# Altium PCB STAND_SSD_2246(CPU).PcbDoc (part 1 of 7)
Units mm, origin at the board's own origin, x right, y up, seen from the top; angles counter-clockwise.
Board outline 70 x 170 mm, 8 copper layers (L1:Top, L2:GND, L3:Sig, L4:VCC, L5:Sig, L6:Sig, L7:GND, L8:Bot), stack 1.112 mm thick; 174 components, 271 nets, 1671 pads, 771 vias.
Unrouted connection lines stored in the file: 138.
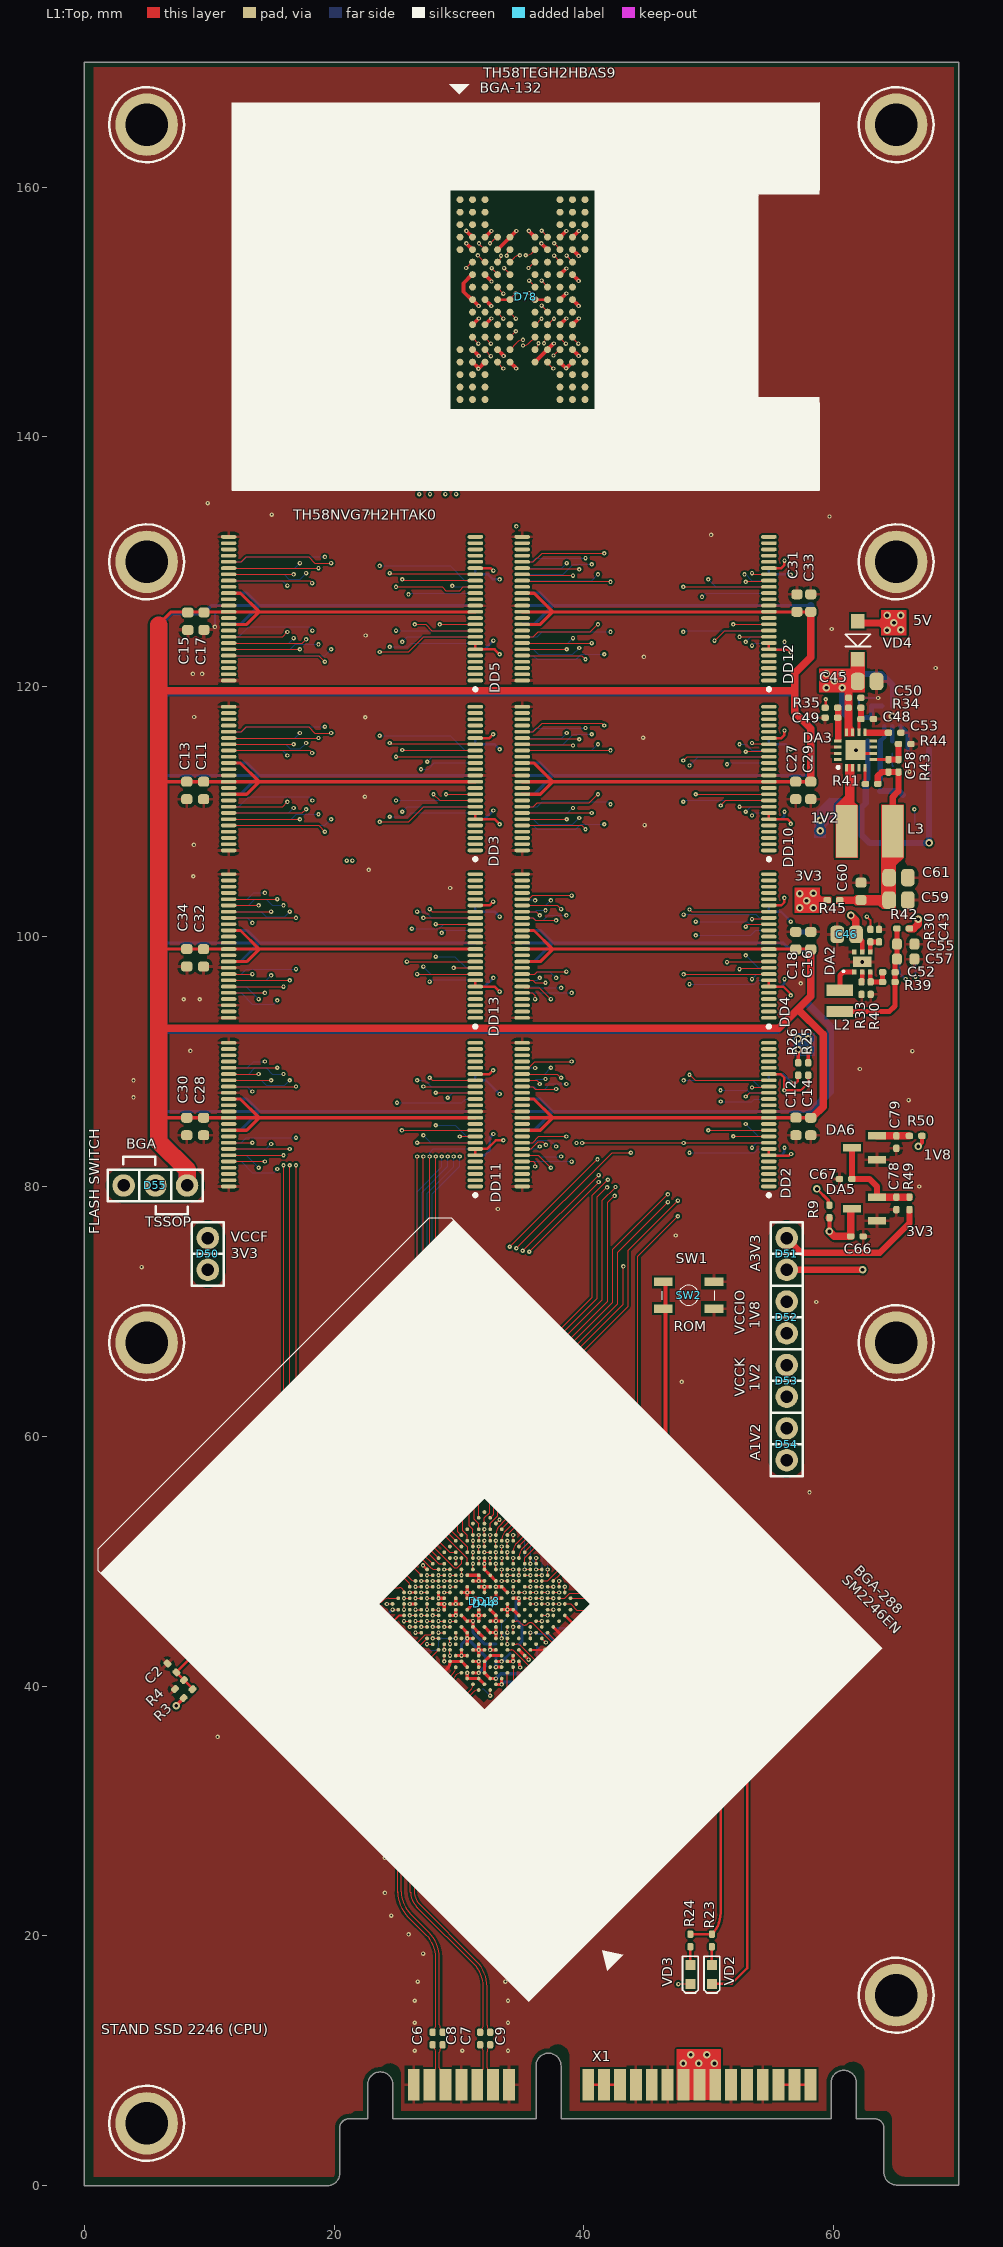
[diagram p0: L1:Top view]
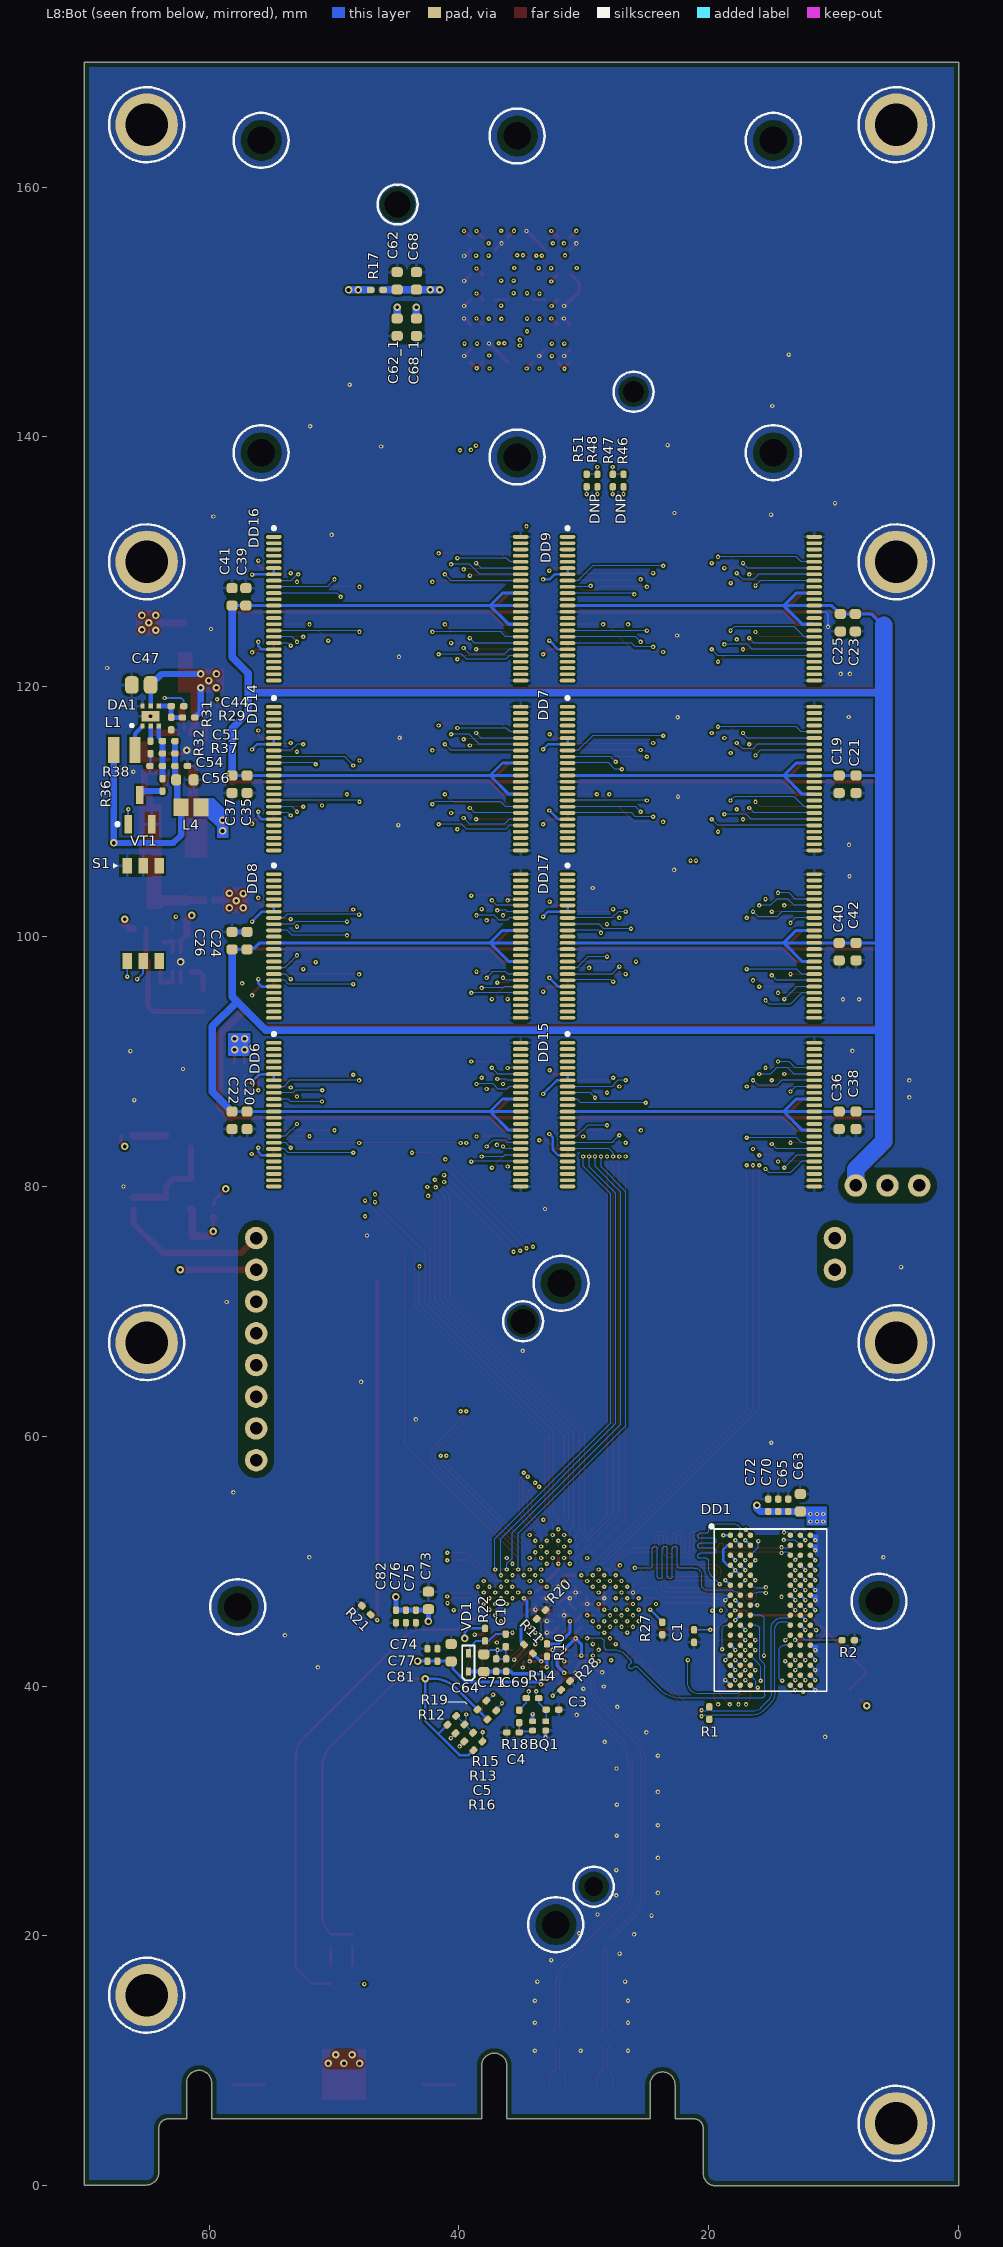
[diagram p1: L8:Bot view, seen from below]
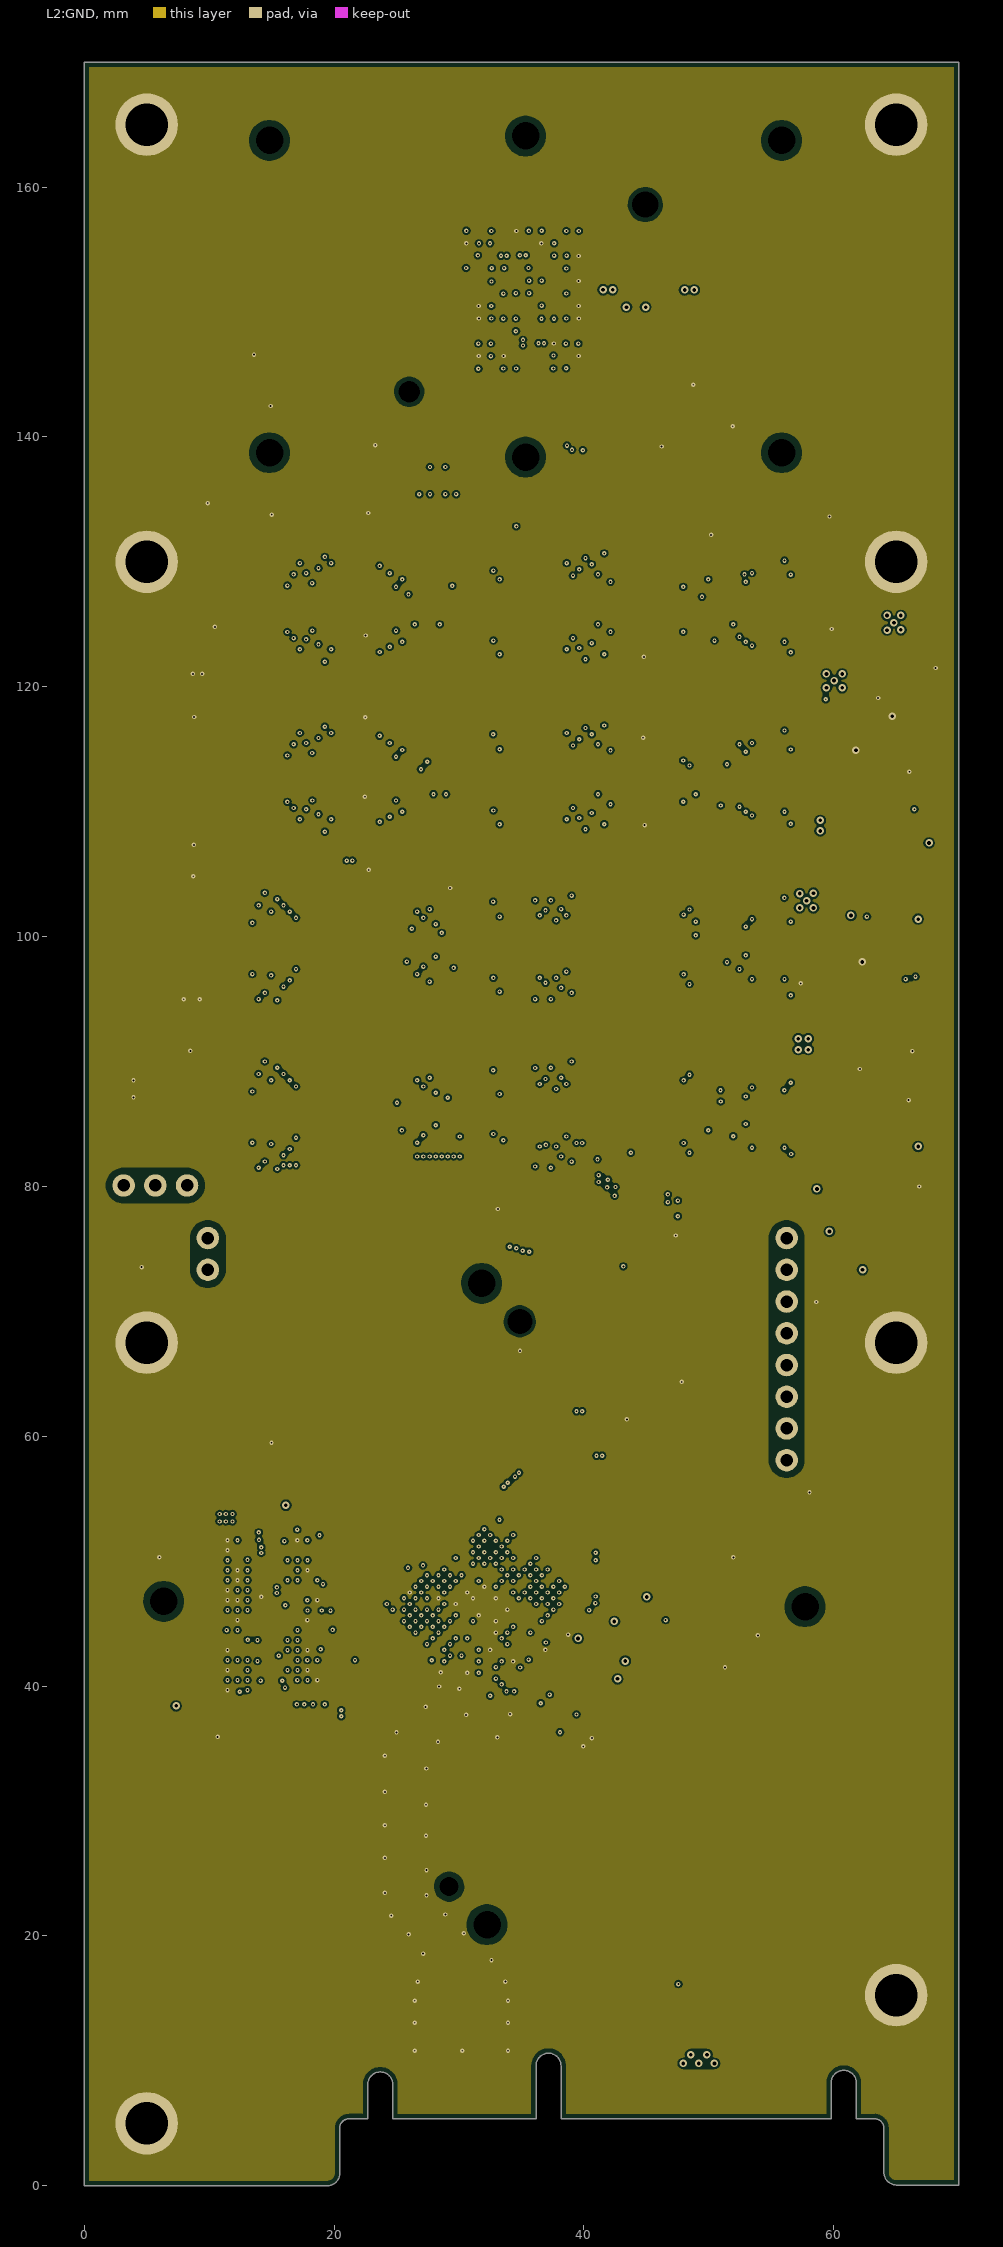
[diagram p2: L2:GND]
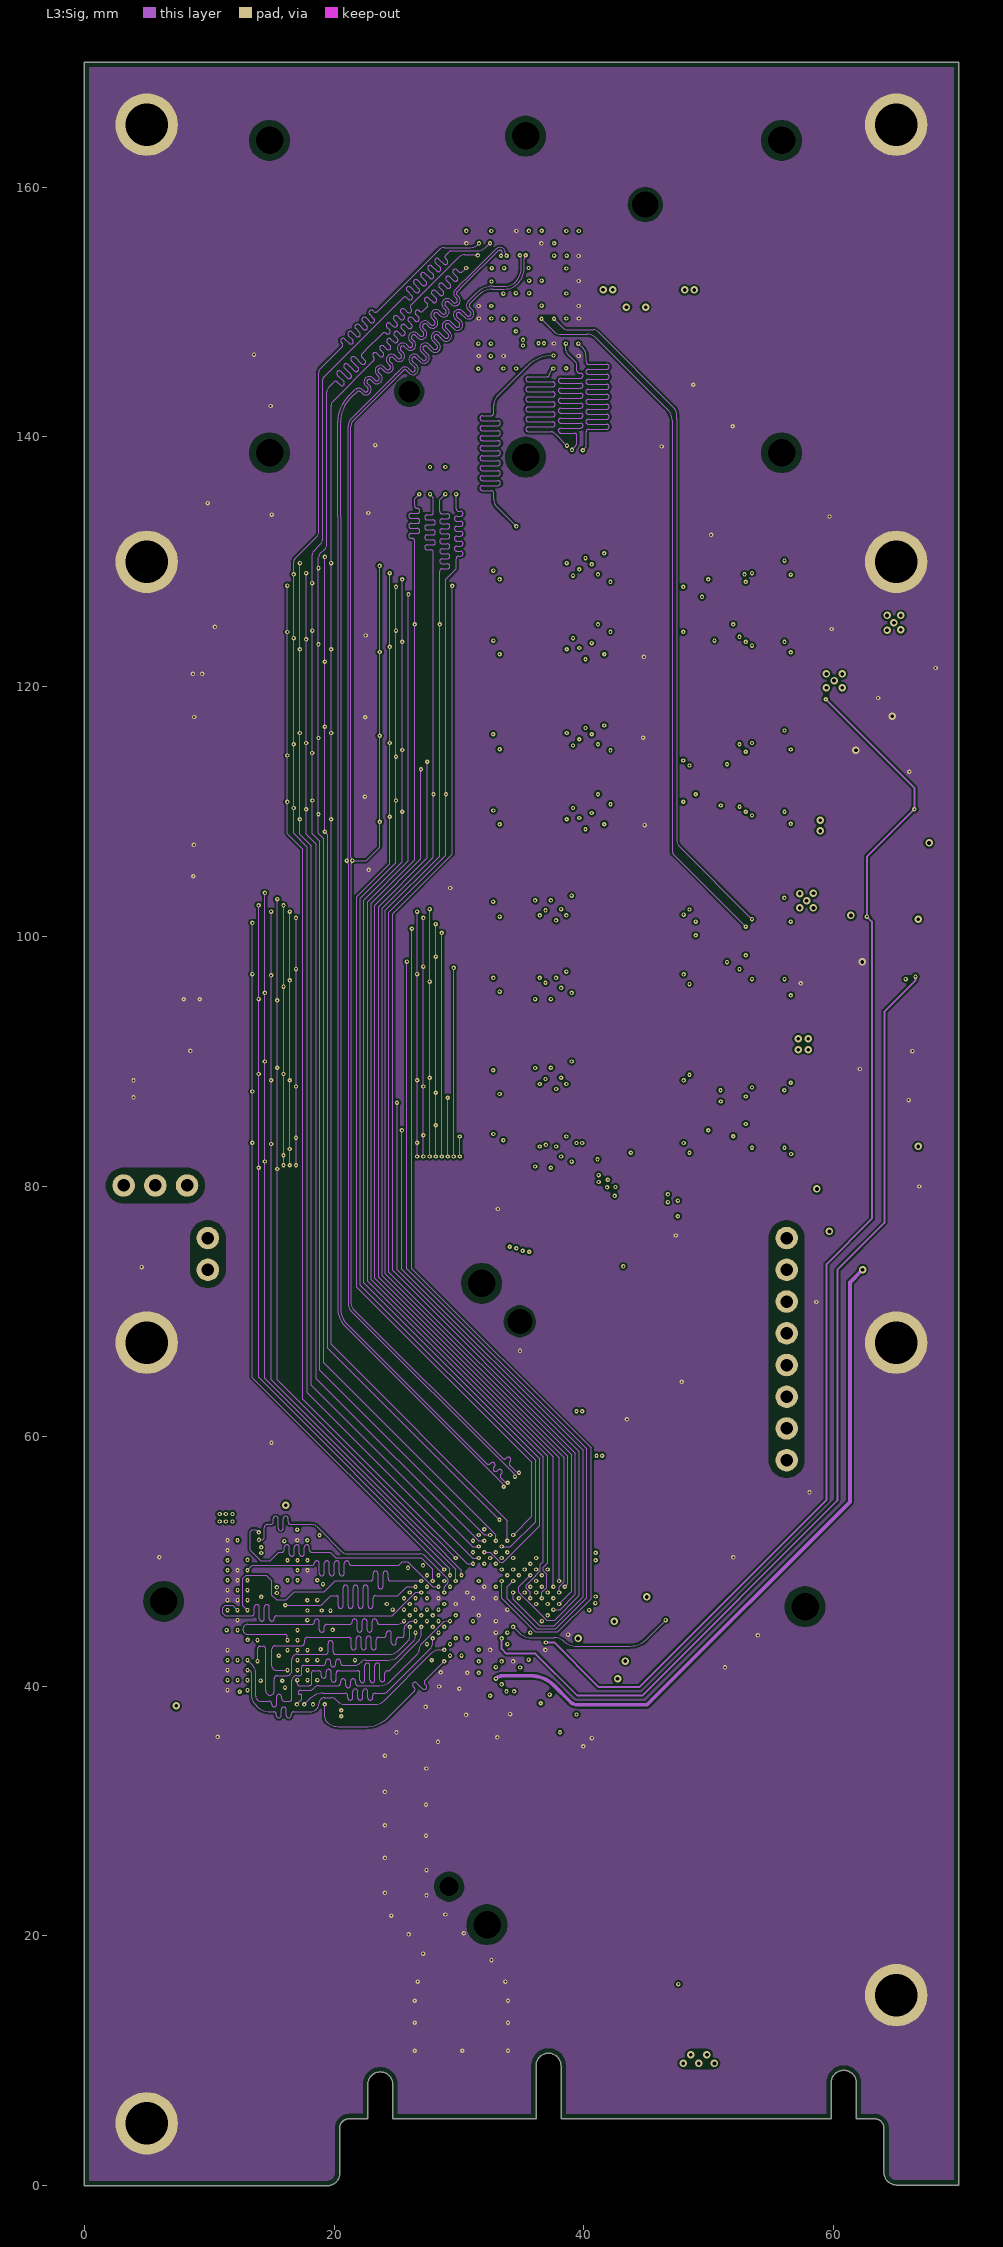
[diagram p3: L3:Sig]
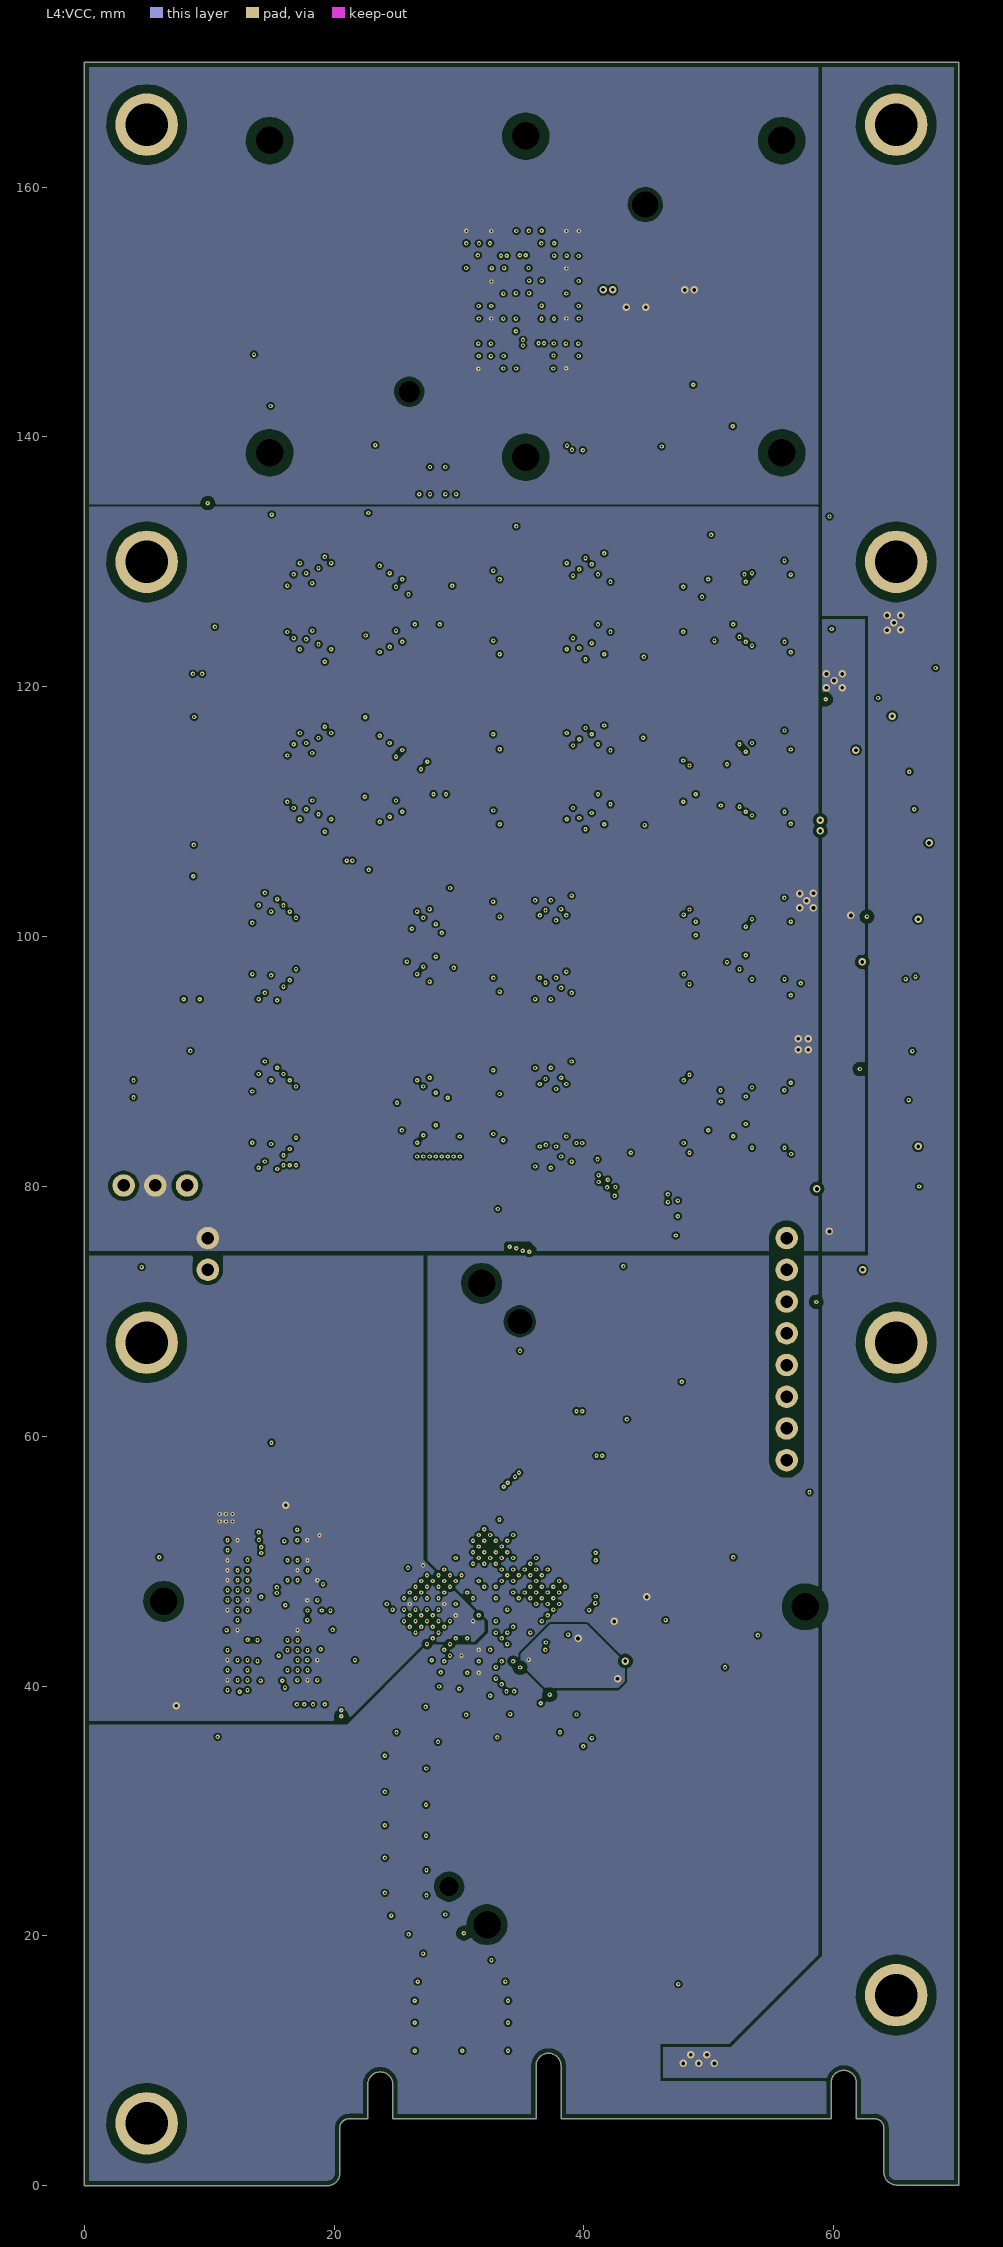
[diagram p4: L4:VCC]
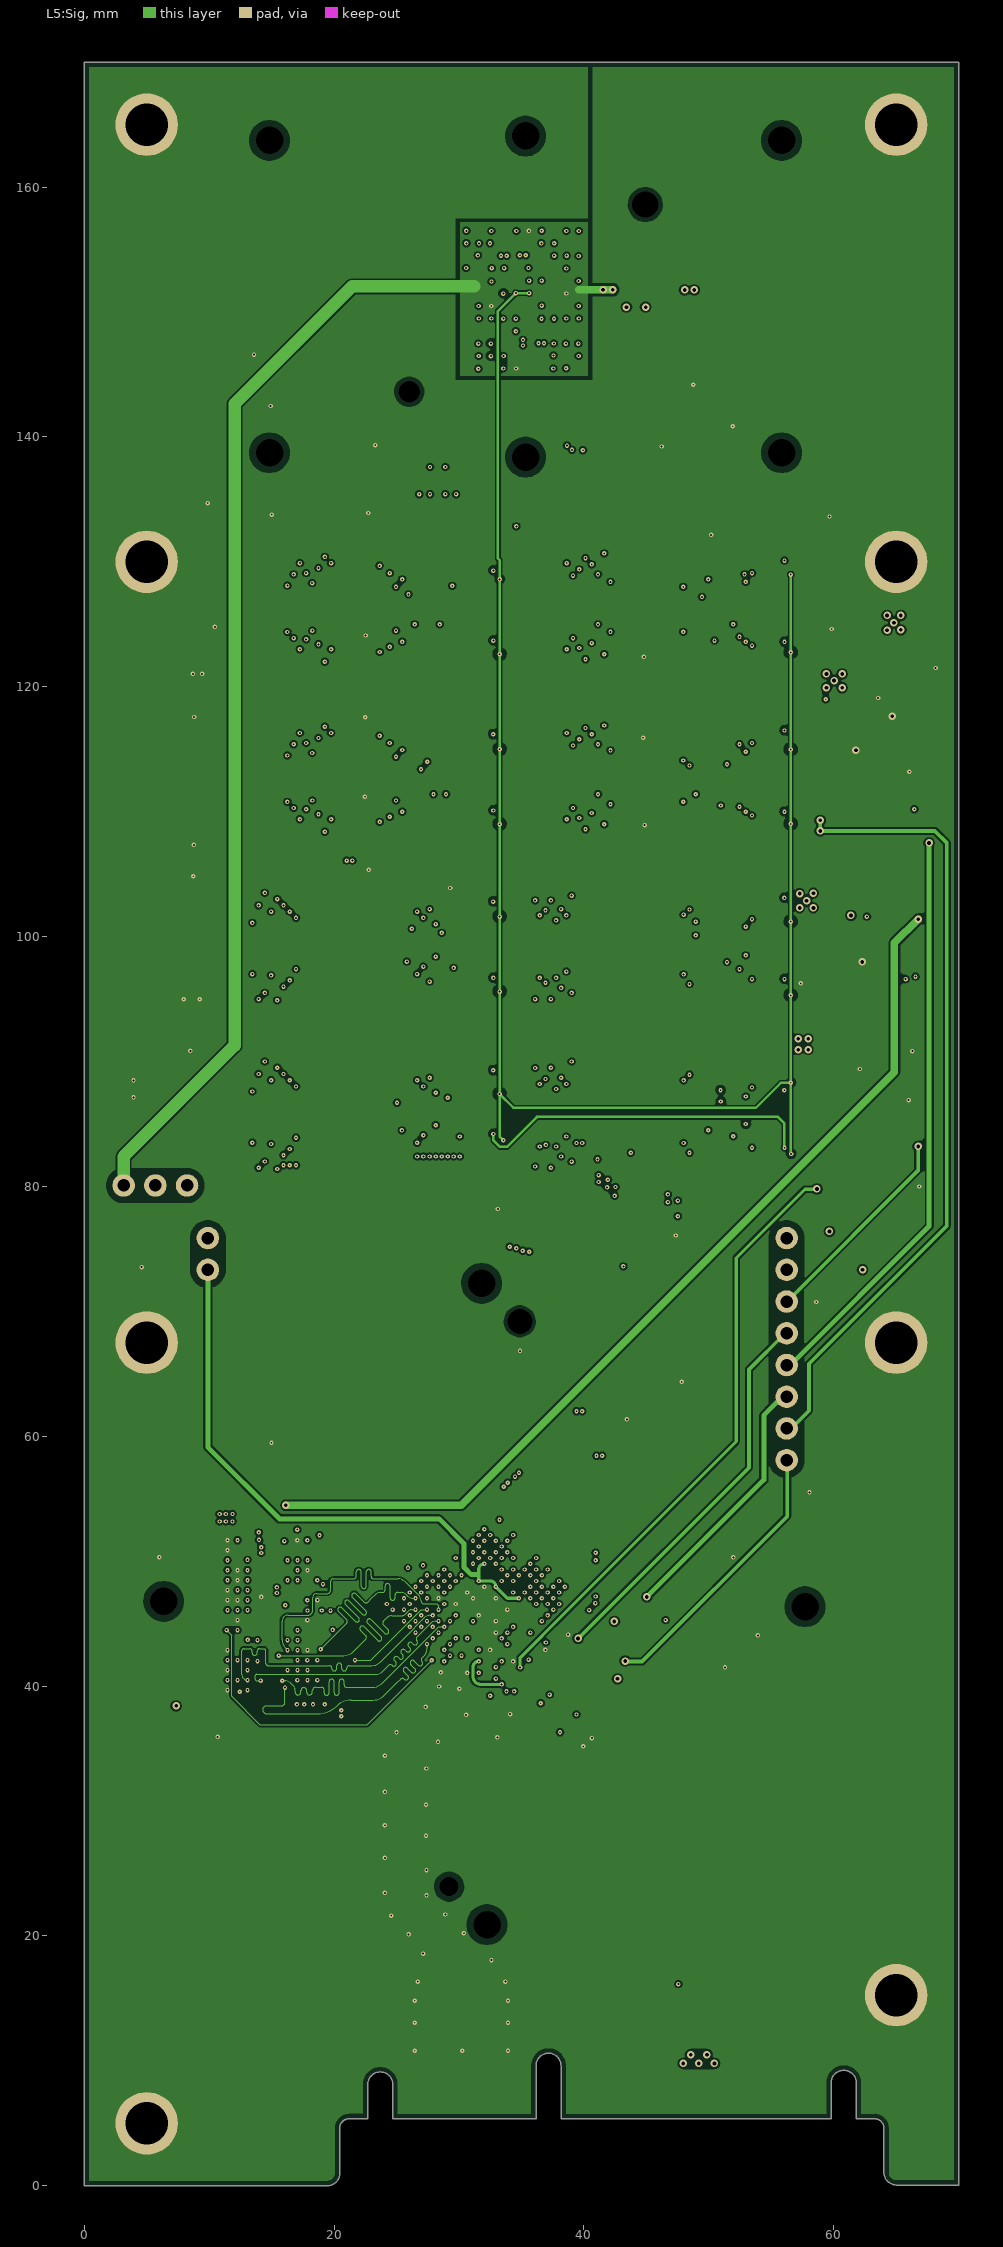
[diagram p5: L5:Sig]
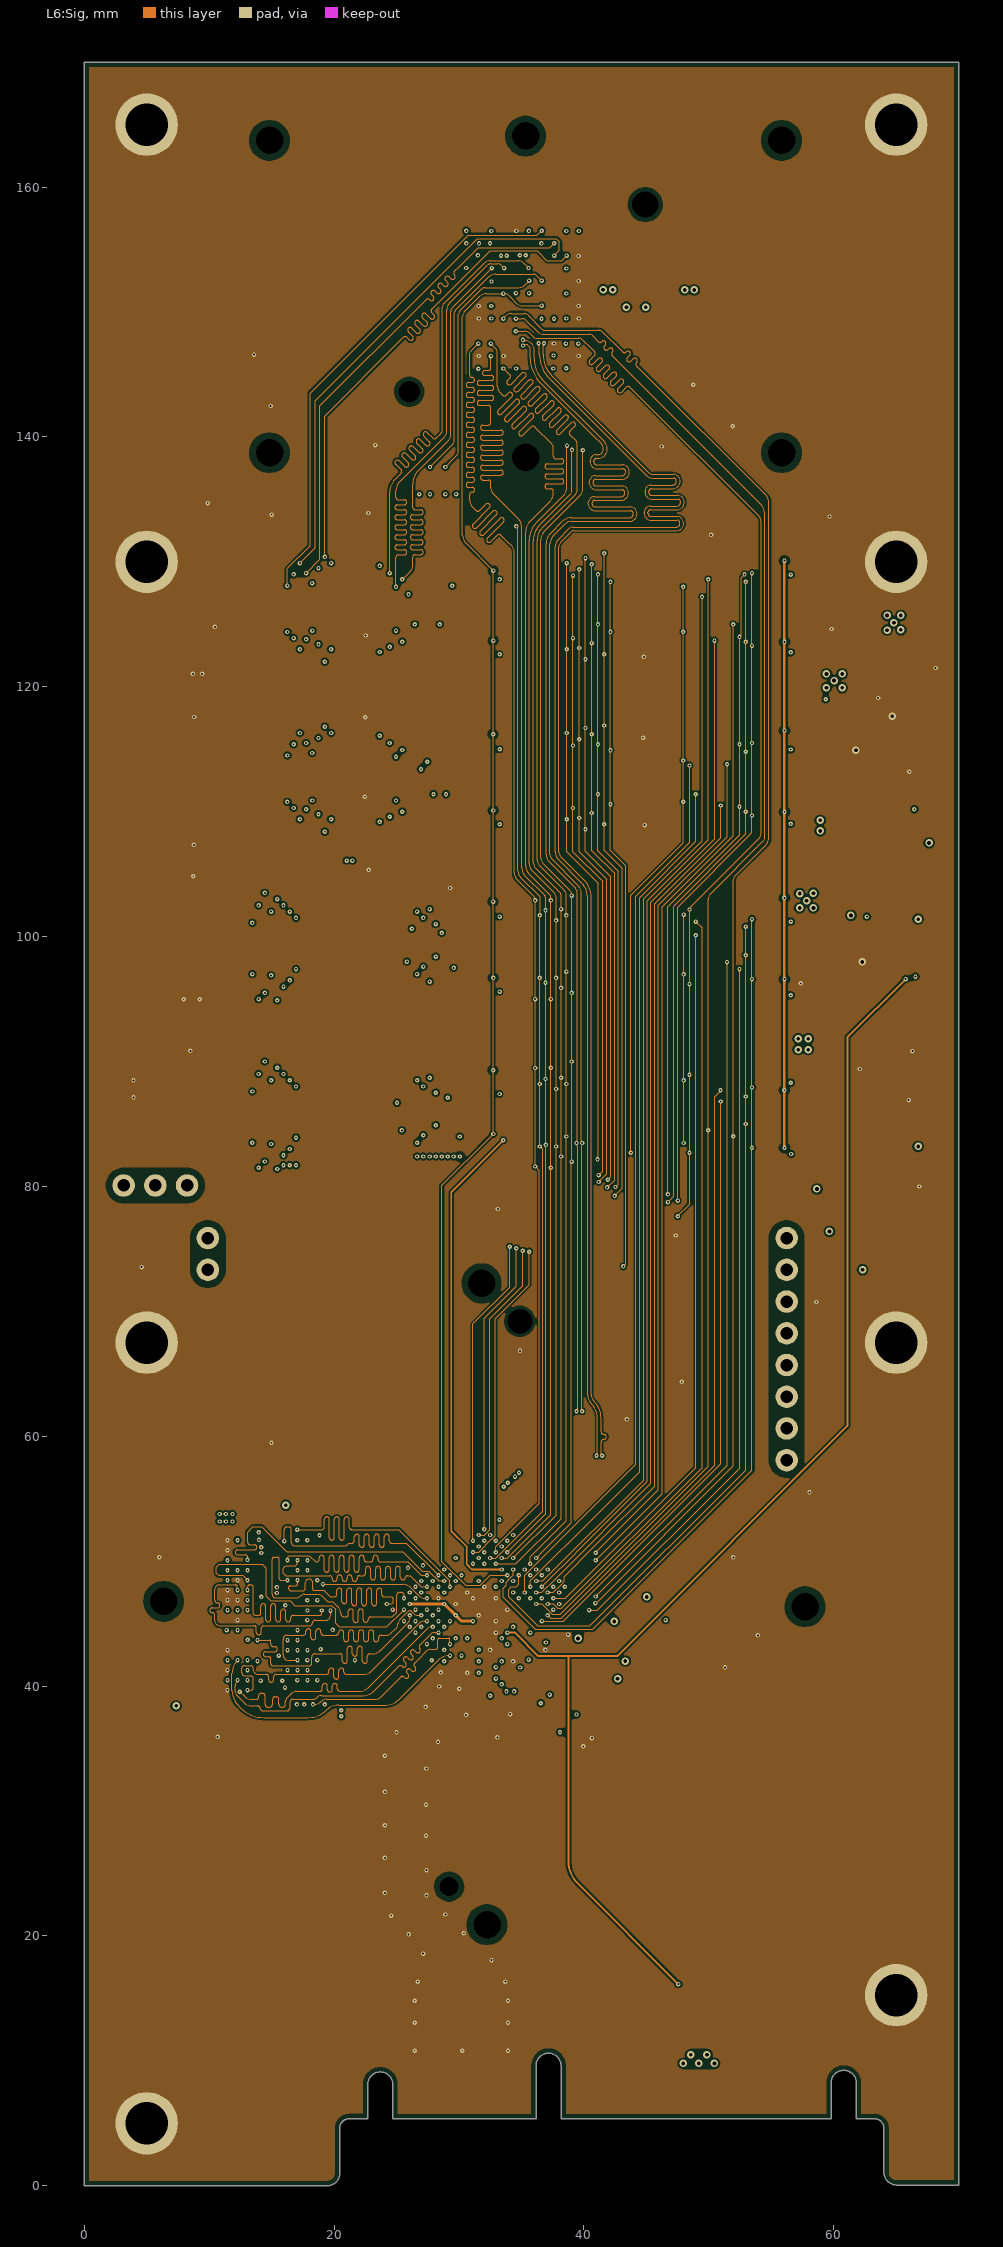
[diagram p6: L6:Sig]
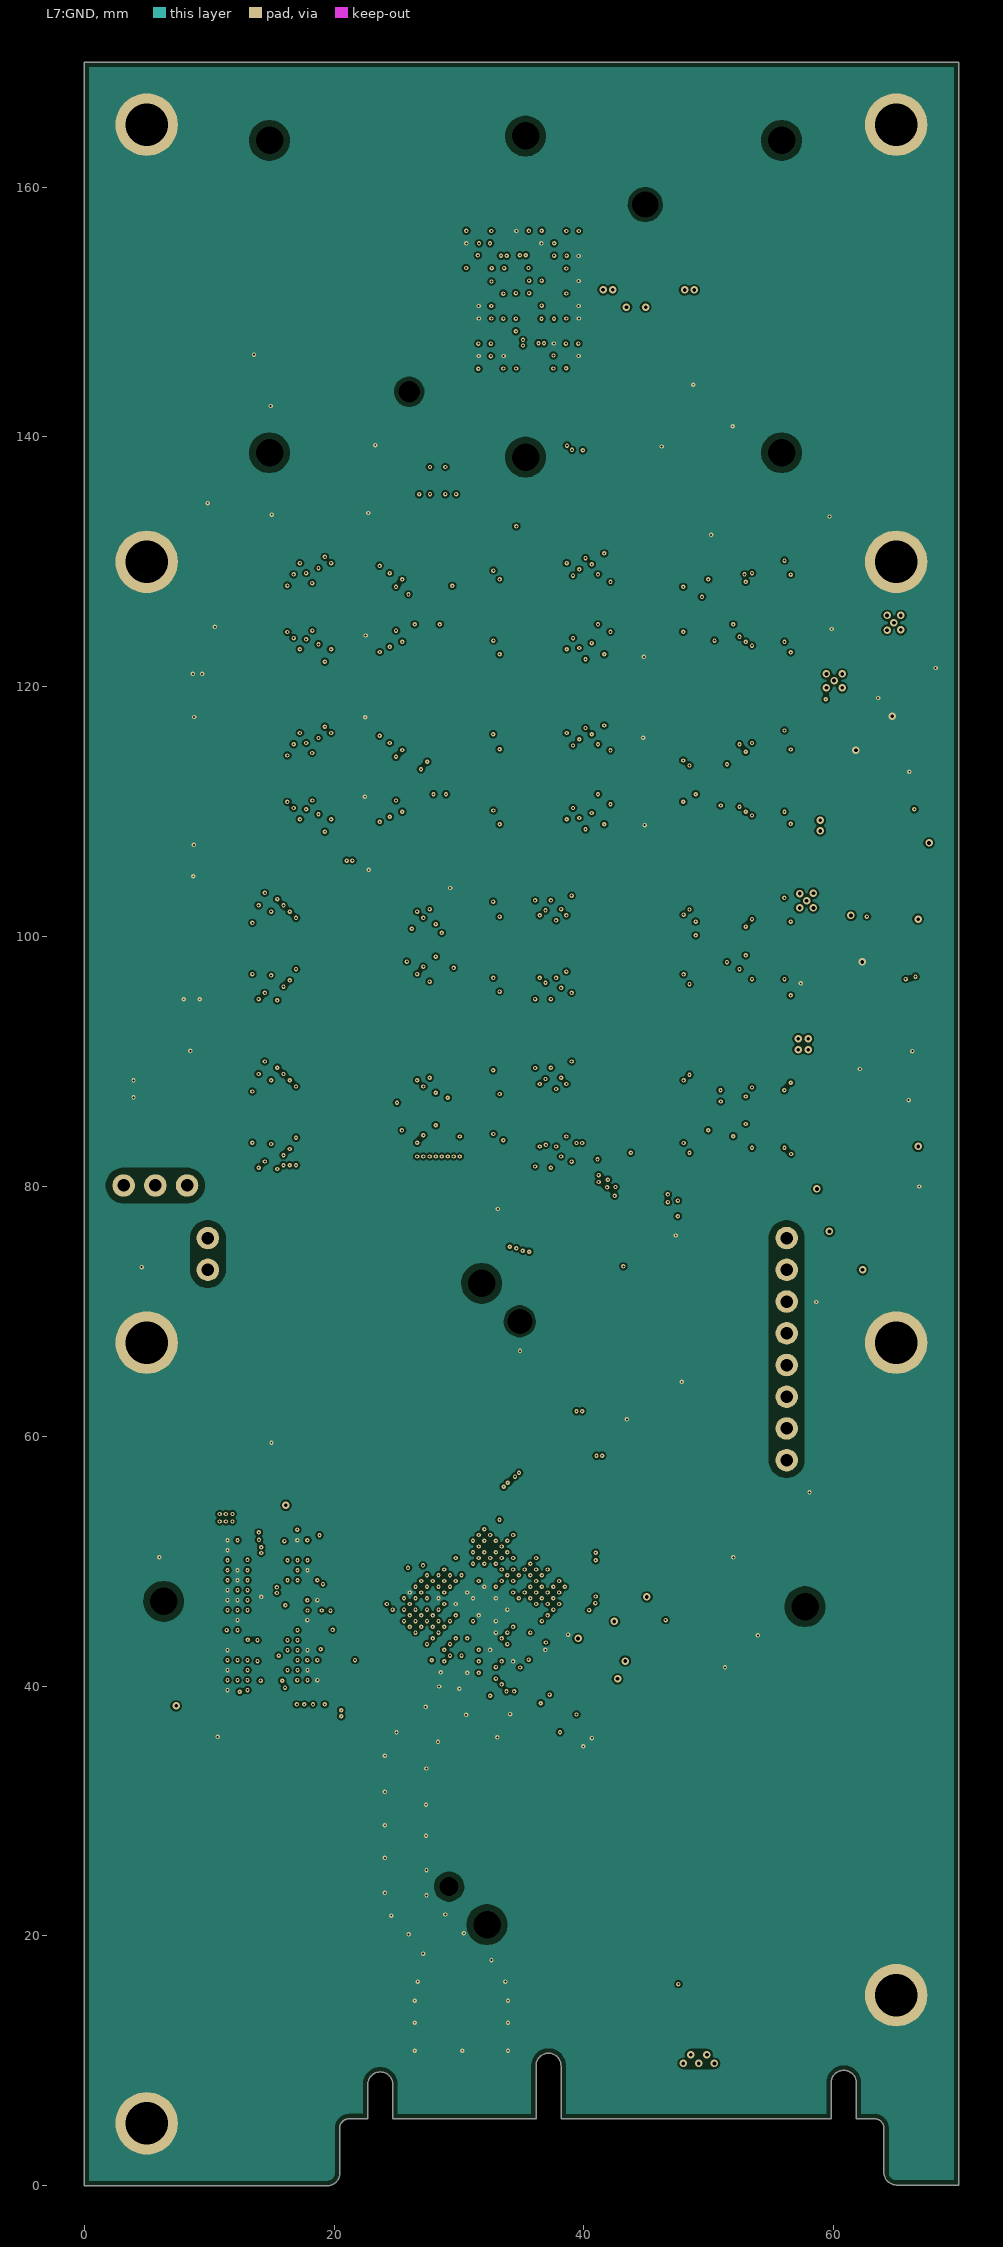
[diagram p7: L7:GND]
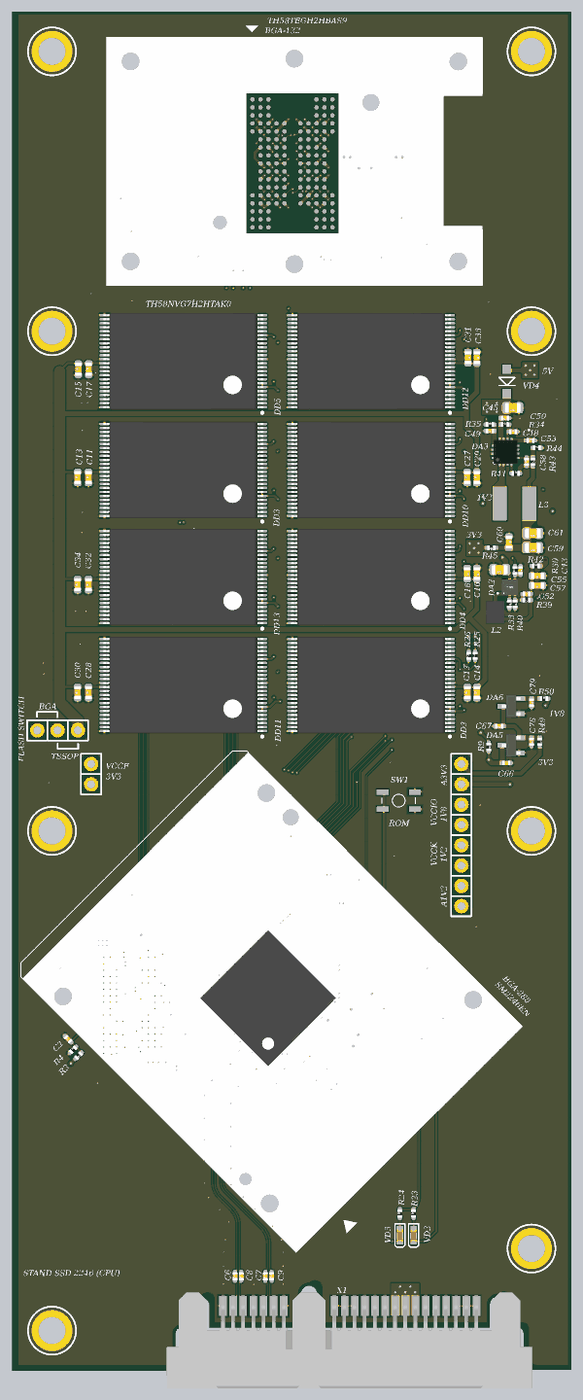
[diagram p14: 3D render of the assembled board from above, using the file's embedded part models]
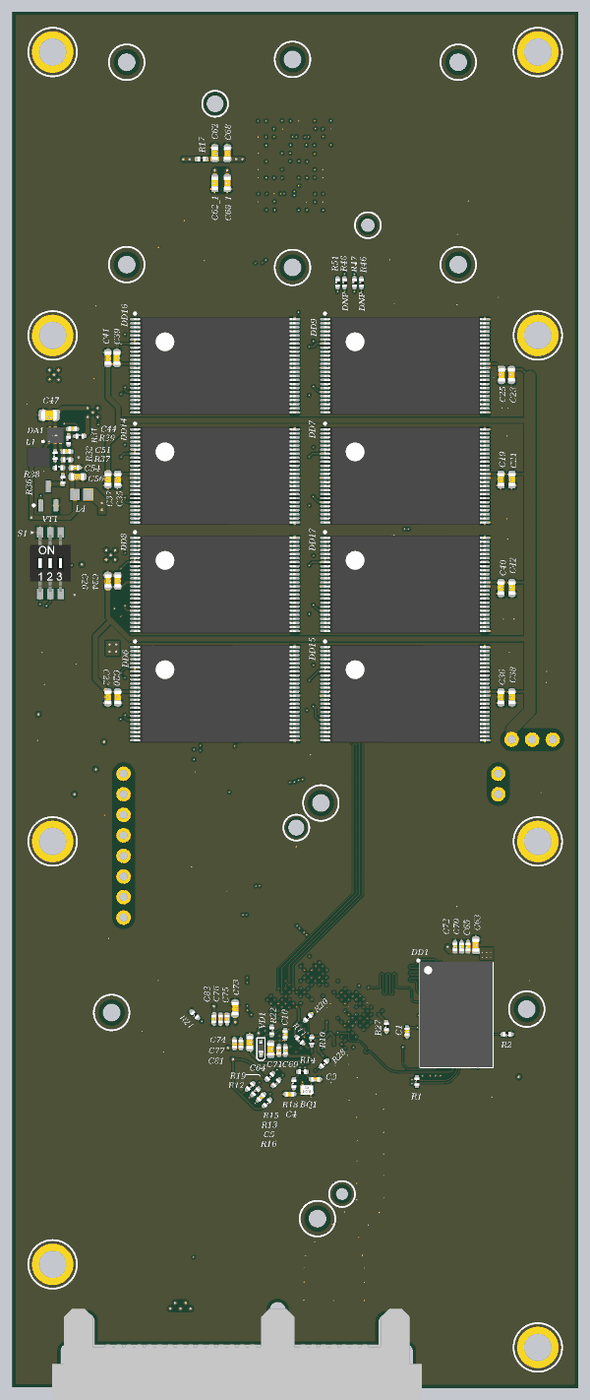
[diagram p15: 3D render of the assembled board from below, using the file's embedded part models]

## Layer stack, top to bottom
Top Solder: solder mask 0.025, SM-001, Dk 3.5
L1:Top: signal copper 0.018
Dielectric 1: prepreg 0.069, FR4_HiTg170 PR, Dk 4.2
L2:GND: signal copper 0.018
Dielectric 3: core 0.25, FR4 HiTg170, Dk 4.3
L3:Sig: signal copper 0.018
Dielectric 2: prepreg 0.045, FR4 HiTg170, Dk 3.9
Dielectric 6: prepreg 0.045, FR4 HiTg170, Dk 3.9
L4:VCC: signal copper 0.018
Dielectric 4: core 0.15, FR4 HiTg170, Dk 4.5
L5:Sig: signal copper 0.018
Dielectric 9: prepreg 0.045, FR4 HiTg170, Dk 3.9
Dielectric 5: prepreg 0.045, FR4 HiTg170, Dk 3.9
L6:Sig: signal copper 0.018
Dielectric 7: core 0.25, FR4 HiTg170, Dk 4.3
L7:GND: signal copper 0.018
Dielectric 8: prepreg 0.069, FR4_HiTg170 PR, Dk 4.2
L8:Bot: signal copper 0.018
Bottom Solder: solder mask 0.025, SM-001, Dk 3.5

## Board outline
0,0 19.452,0 ccw(c19.452,1) 20.452,1 20.452,4.614 cw(c21.202,4.614) 21.202,5.364 22.702,5.364 22.702,8.114 cw(c23.702,8.114) 24.702,8.114 24.702,5.364 36.172,5.364 36.172,9.618 cw(c37.172,9.618) 38.172,9.618 38.172,5.364 59.802,5.364 59.802,8.251 cw(c60.802,8.251) 61.802,8.251 61.802,5.364 63.272,5.364 cw(c63.272,4.614) 64.022,4.614 64.022,1.064 ccw(c65.022,1.064) 65.022,0.064 69.999,0.064 69.999,170 0,170

## Design rules (kind name [scope] priority, off if disabled: settings)
BoardOutlineClearance [All] p1: gap=0.2 ignorepadtopadclearanceinfootprint=FALSE except(0.4: Poly-OutlineEdge)
Clearance Clearance_BGA [WithinRoom('BGA')] p1: gap=0.1 ignorepadtopadclearanceinfootprint=FALSE except(0.15: Arc-Fill Arc-Poly Arc-Region Track-Fill Track-Poly Track-Region SMDPad-Fill SMDPad-Poly SMDPad-Region THPad-Fill THPad-Poly THPad-Region Via-Fill Via-Poly Via-Region Fill-Fill Fill-Poly Fill-Region Poly-Poly Poly-Region Region-Region)
Clearance Clearance_BGA2 [WithinRoom('BGA2')] p2: gap=0.1 ignorepadtopadclearanceinfootprint=FALSE except(0.15: Arc-Fill Arc-Poly Arc-Region Track-Fill Track-Poly Track-Region SMDPad-Fill SMDPad-Poly SMDPad-Region THPad-Fill THPad-Poly THPad-Region Via-Fill Via-Poly Via-Region Fill-Fill Fill-Poly Fill-Region Poly-Poly Poly-Region Region-Region)
Clearance [All] p3: gap=0.1 ignorepadtopadclearanceinfootprint=FALSE except(0.15: Arc-Fill Arc-Poly Arc-Region Track-Fill Track-Poly Track-Region SMDPad-Fill SMDPad-Poly SMDPad-Region THPad-Fill THPad-Poly THPad-Region Via-Fill Via-Poly Via-Region Fill-Fill Fill-Poly Fill-Region Poly-Poly Poly-Region Region-Region)
ComponentClearance [All] p1: gap=-100 collisioncheckmode=3 verticalgap=0.254 showdistances=FALSE
DiffPairsRouting [All] p1: maxlimit=0.2 minlimit=0.13 mostfreqgap=0.2 toplayer_mingap=0.2 toplayer_minwidth=0.1 toplayer_maxwidth=0.1 toplayer_prefwidth=0.1 midlayer1_maxgap=0.13 midlayer1_prefgap=0.13 midlayer1_minwidth=0.1 midlayer1_maxwidth=0.1 midlayer1_prefwidth=0.1 midlayer2_maxgap=0.13 midlayer2_prefgap=0.13 midlayer2_minwidth=0.1 midlayer2_maxwidth=0.1 midlayer2_prefwidth=0.1 midlayer3_mingap=0.2 midlayer3_minwidth=0.1 midlayer3_maxwidth=0.1 midlayer3_prefwidth=0.1 midlayer4_mingap=0.2 midlayer4_minwidth=0.1 midlayer4_maxwidth=0.1 midlayer4_prefwidth=0.1 midlayer5_mingap=0.2 midlayer5_minwidth=0.1 midlayer5_maxwidth=0.1 midlayer5_prefwidth=0.1 midlayer6_mingap=0.2 midlayer6_minwidth=0.1 midlayer6_maxwidth=0.1 midlayer6_prefwidth=0.1 bottomlayer_mingap=0.2 bottomlayer_minwidth=0.1 bottomlayer_maxwidth=0.1 bottomlayer_prefwidth=0.1 maxuncoupledlength=12.7
FanoutControl Fanout_BGA [IsBGA] p1: bgadir=Out bgaviamode=Centered fanoutstyle=BGA fanoutdirection=Alternating viagrid=0.025 // Fanout_BGA (Default Rule)
HoleSize [All] p1: absolutevalues=TRUE maxlimit=3.8 minlimit=0.025 maxpercent=80.000 minpercent=20.000
HoleToHoleClearance [All] p1: gap=0.2 allowstackedmicrovias=TRUE
MatchedLengths MatchedLengths_BGA_FLASH_1 [InxSignalClass('FLASH_DIF_BGA')] p1: tolerance=25.4 checknetsindiffpair=FALSE checkdiffpairvsdiffpair=TRUE checkxsignals=TRUE checkothers=TRUE usedelayunits=TRUE delaytolerance=70.000000
MatchedLengths MatchedLengths_DDR_CLOCKS_STROBES [InxSignalClass('DATA_BL0')] p2: tolerance=0.5 checknetsindiffpair=TRUE checkdiffpairvsdiffpair=FALSE checkxsignals=FALSE checkothers=FALSE usedelayunits=TRUE delaytolerance=20.000000
MatchedLengths MatchedLengths_DATA_BL0 [InxSignalClass('DATA_BL0')] p3: tolerance=0.5 checknetsindiffpair=FALSE checkdiffpairvsdiffpair=TRUE checkxsignals=TRUE checkothers=TRUE usedelayunits=TRUE delaytolerance=50.000000
MatchedLengths MatchedLengths_DD4_0_OUT_1 [InxSignalClass('DD4_0_OUT_1')] p4: tolerance=5 checknetsindiffpair=FALSE checkdiffpairvsdiffpair=TRUE checkxsignals=TRUE checkothers=TRUE usedelayunits=TRUE delaytolerance=50.000000
MaxMinImpedance [InNetClass('IO')] p1: minimum=45.00 maximum=55.00
MinimumSolderMaskSliver [All] p1: minsoldermaskwidth=0.099
PlaneConnect [All] p1: planeconnectstyle=Direct reliefexpansion=0.508 reliefentries=4 reliefconductorwidth=0.254 reliefairgap=0.254
PolygonConnect Polygon_5V [InNet('+5V')] p1: thpad.connectstyle=Direct thpad.reliefconductorwidth=0.254 thpad.reliefentries=4 thpad.polygonreliefangle="90 Angle" thpad.airgapwidth=0.254 smdpad.connectstyle=Relief smdpad.reliefconductorwidth=0.254 smdpad.reliefentries=4 smdpad.polygonreliefangle="90 Angle" smdpad.airgapwidth=0.254 via.connectstyle=Direct via.reliefconductorwidth=0.254 via.reliefentries=4 via.polygonreliefangle="90 Angle" via.airgapwidth=0.254
PolygonConnect [All] p2: thpad.connectstyle=Direct thpad.reliefconductorwidth=0.254 thpad.reliefentries=4 thpad.polygonreliefangle="90 Angle" thpad.airgapwidth=0.254 smdpad.connectstyle=Relief smdpad.reliefconductorwidth=0.254 smdpad.reliefentries=4 smdpad.polygonreliefangle="90 Angle" smdpad.airgapwidth=0.254 via.connectstyle=Direct via.reliefconductorwidth=0.254 via.reliefentries=4 via.polygonreliefangle="90 Angle" via.airgapwidth=0.254
RoomDefinition BGA [InComponentClass('Room Definition 1')] p1: confinementstyle=ConfineIn formatcopy=TRUE lockcomponents=FALSE outline 33.195,32.178 42.704,41.584 33.411,50.778 23.902,41.373
RoomDefinition BGA2 [InComponentClass('Components Class 1')] p2: confinementstyle=ConfineIn formatcopy=TRUE lockcomponents=FALSE outline 11.786,48.277 11.786,34.277 21.386,34.277 21.386,48.277
RoutingCorners [All] p1: cornerstyle=Round minsetback=2.54 maxsetback=2.54
RoutingTopology RoutingTopology_DDRAddressAndControls [InNetClass('DDR_AddressAndControls')] p1: topology=Daisy_Simple
RoutingTopology [All] p2: topology=Shortest
RoutingVias RoutingVias_BGA [WithinRoom('BGA')] p1: holewidth=0.2 width=0.35 viastyle="Through Hole" minholewidth=0.2 minwidth=0.35 maxholewidth=0.2 maxwidth=0.4
RoutingVias RoutingVias_BGA2 [WithinRoom('BGA2')] p2: holewidth=0.2 width=0.35 viastyle="Through Hole" minholewidth=0.2 minwidth=0.35 maxholewidth=0.2 maxwidth=0.4
RoutingVias [All] p3: holewidth=0.3 width=0.6 viastyle="Through Hole" minholewidth=0.2 minwidth=0.35 maxholewidth=0.8 maxwidth=1.2
SilkToSilkClearance [All] p1: silktosilkclearance=0.15
SilkToSolderMaskClearance [IsPad] p1: minsilkscreentomaskgap=0.15 clearancetoexposedcopper=TRUE
SolderMaskExpansion [All] p1: expansion=0.05 istentingtop=FALSE
Width Width_Power [InNetClass('Power')] p1: maxlimit=1.5 minlimit=0.1 preferedwidth=0.35 midlayer1_maxwidth=1 midlayer2_maxwidth=1 midlayer3_maxwidth=1 midlayer4_maxwidth=1 midlayer4_prefwidth=0.2 midlayer5_maxwidth=1 midlayer5_prefwidth=0.2 midlayer6_maxwidth=1 midlayer6_prefwidth=0.2 minimp=50.000000 maximp=50.000000 favimp=50.000000
Width Width_BGA2 [WithinRoom('BGA2')] p2: maxlimit=0.3 minlimit=0.1 preferedwidth=0.1 midlayer4_maxwidth=0.1 midlayer5_maxwidth=0.1 midlayer6_maxwidth=0.1 minimp=40.000000 maximp=50.000000 favimp=50.000000
Width Width_BGA [WithinRoom('BGA')] p3: maxlimit=0.2 minlimit=0.1 preferedwidth=0.1 midlayer1_maxwidth=0.15 midlayer2_maxwidth=0.15 midlayer3_maxwidth=0.15 midlayer4_maxwidth=0.1 midlayer5_maxwidth=0.1 midlayer6_maxwidth=0.1 bottomlayer_maxwidth=0.15 minimp=40.000000 maximp=50.000000 favimp=50.000000
Width [All] p4: maxlimit=1 minlimit=0.1 preferedwidth=0.2
19 further rules are at their usual default settings.

## Classes and differential pairs
differential pair class BGA_FLASH_DIFF: F0DQS F0REN F1DQS F1REN
net class BGA_FLASH: F0D0 F0D1 F0D2 F0D3 F0D4 F0D5 F0D6 F0D7 F0DQS_N F0DQS_P F0REN_N F0REN_P F1D0 F1D1 F1D2 F1D3 F1D4 F1D5 F1D6 F1D7 F1DQS_N F1DQS_P F1REN_N F1REN_P
component class DRAM-DDR3: C1 C2 DD1 R1 R3 R4
component class Main: BQ1 C3 C4 C5 C6 C19 C20 C23 C40 C44 C46 C48 C49 C51 C52 C55 C56 C58 C66 C72 C76 C78 DA2 DD8 DD9 JMP1 JMP2 JMP3 R9 R11 R13 R15 R25 R26 R28 R29 R37 R43 R44 R45 S1 VD1 VD2 VD4 X1
component class "NAND Flash": C4 C8 C10 C11 C12 C14 C16 C18 C27 C28 C30 C31 C34 C43 C55 C58 C60 C64 C67 C71 C74 C79 C81 DD2 DD3 DD4 DD5 DD6 DD7 DD8 DD9 DD14 DD15 DD16 DD17 R37
component class Power: C6 C8 C15 C16 C19 C20 C22 C23 C24 C26 C28 C32 C35 C36 C38 C39 C40 C42 C44 C48 C49 C50 C52 C54 C55 C56 C58 C63 C64 C65 C70 C76 DA2 DA5 DA6 L3 L4 R29 R45 VD4 VT1
net class F0: F0ALE F0CE0 F0CE1 F0CE2 F0CE3 F0CE4 F0CE5 F0CE6 F0CE7 F0CLE F0D0 F0D1 F0D2 F0D3 F0D4 F0D5 F0D6 F0D7 F0REN_P F0WEN
net class F1: F1ALE F1CE0 F1CE1 F1CE2 F1CE3 F1CE4 F1CE5 F1CE6 F1CE7 F1CLE F1D0 F1D1 F1D2 F1D3 F1D4 F1D5 F1D6 F1D7 F1REN_P F1WEN
net class F2: F2ALE F2CE0 F2CE1 F2CE2 F2CE3 F2CE4 F2CE5 F2CE6 F2CE7 F2CLE F2D0 F2D1 F2D2 F2D3 F2D4 F2D5 F2D6 F2D7 F2REN_P F2WEN
net class F3: F3ALE F3CE0 F3CE1 F3CE2 F3CE3 F3CE4 F3CE5 F3CE6 F3CE7 F3CLE F3D0 F3D1 F3D2 F3D3 F3D4 F3D5 F3D6 F3D7 F3REN_P F3WEN
net class Power: +3V3 +5V +M3V3 A1V2 A3V3 DA_0 DA_1 DA_2 DDR_VREF DRAM_1V5 FRB FWP GND LDO_1V8 NetC62_2 NetDA1_1 NetDA1_2 NetDA2_2 NetDA3_4 NetDA4_1 NetDA4_3 PWM-33V VAA VCC5I VCC5VI VCCF VCCIO VCCK VDTD_VIN VDTF_VIN Vout
net class DifPair: DDR_CLK_N DDR_CLK_P DQS_0_N DQS_0_P DQS_1_N DQS_1_P RX1_N RX1_P RX_N RX_P TX1_N TX1_P TX_N TX_P
net class IDE: CS_N0 CS_N1 CSEL DA_0 DA_1 DA_2 DD0 DD1 DD2 DD3 DD4 DD5 DD6 DD7 DD8 DD9 DD10 DD11 DD12 DD13 DD14 DD15 DIOR DIOW DMACK DMARQ INTRQ IORDY PDIAG RESET ~IOCS16
net class DDR_AddressAndControls: A0 A1 A2 A3 A4 A5 A6 A7 A8 A9 A10 A11 A12 A13 A14 A15 BA_0 BA_1 BA_2 CAS# CS#_0 DDR_CLK_N DDR_CLK_P ODT_0 RAS# WE#
differential pair F1REN: +F1REN_P -F1REN_N
differential pair F1DQS: +F1DQS_P -F1DQS_N
differential pair F0REN: +F0REN_P -F0REN_N
differential pair F0DQS: +F0DQS_P -F0DQS_N
differential pair TX4: +NetC7_1 -NetC9_1
differential pair TX3: +NetC9_2 -NetC7_2
differential pair RX4: +NetC6_1 -NetC8_1
differential pair RX3: +NetC6_2 -NetC8_2
differential pair RX2: +NetC86_1 -NetC89_1
differential pair TX2: +NetC88_1 -NetC85_1
differential pair DDR_CLK: +DDR_CLK_P -DDR_CLK_N
differential pair DQS_0: +DQS_0_P -DQS_0_N
differential pair DQS_1: +DQS_1_P -DQS_1_N
differential pair RX1: +RX1_P -RX1_N
differential pair RX: +RX_P -RX_N
differential pair TX1: +TX1_P -TX1_N
differential pair TX: +TX_P -TX_N

## Components (designator, comment, footprint, x,y, rotation, side; value= is the part's Value field where it differs from the comment)
BQ1 "S2520A" KX-4T 33.577,36.821 r0 bottom value=50MHz
C1 "CAPC_0402" CC0402 21.181,44.005 r270 bottom value=0.1uF
C2 "CAPC_0402" CC0402 7.02,41.455 r135 top value=0.1uF
C3 "CAPC_0402" CC0402 32.514,38.118 r0 bottom value=8.2pF
C4 "CAPC_0402" CC0402 35.67,36.293 r180 bottom value=8.2pF
C5 "CAPC_0402" CC0402 39.22,35.916 r135 bottom value=0.22uF
C6 "CAPC_0402" CC0402 27.892,11.788 r90 top value=10nF
C7 "CAPC_0402" CC0402 31.699,11.788 r90 top value=10nF
C8 "CAPC_0402" CC0402 28.687,11.788 r90 top value=10nF
C9 "CAPC_0402" CC0402 32.499,11.788 r90 top value=10nF
C10 "CAPC_0402" CC0402 36.255,43.669 r90 bottom value=1nF
C11 "CAPC_0603" CC0603 9.559,111.7 r90 top locked value=1uF
C12 "CAPC_0603" CC0603 56.979,84.802 r90 top locked value=1uF
C13 "CAPC_0603" CC0603 8.209,111.7 r90 top locked value=0.1uF
C14 "CAPC_0603" CC0603 58.159,84.8 r90 top locked value=0.1uF
C15 "CAPC_0603" CC0603 8.289,125.248 r90 top locked value=1uF
C16 "CAPC_0603" CC0603 58.163,99.681 r270 top locked value=1uF
C17 "CAPC_0603" CC0603 9.589,125.253 r90 top locked value=0.1uF
C18 "CAPC_0603" CC0603 56.963,99.681 r270 top locked value=0.1uF
C19 "CAPC_0603" CC0603 9.559,112.2 r90 bottom value=1uF
C20 "CAPC_0603" CC0603 56.959,85.3 r90 bottom value=1uF
C21 "CAPC_0603" CC0603 8.209,112.2 r90 bottom value=0.1uF
C22 "CAPC_0603" CC0603 58.164,85.3 r90 bottom value=0.1uF
C23 "CAPC_0603" CC0603 8.27,125.133 r90 bottom value=1uF
C24 "CAPC_0603" CC0603 56.958,99.678 r270 bottom value=1uF
C25 "CAPC_0603" CC0603 9.47,125.133 r90 bottom value=0.1uF
C26 "CAPC_0603" CC0603 58.163,99.678 r270 bottom value=0.1uF
C27 "CAPC_0603" CC0603 56.959,111.7 r90 top locked value=1uF
C28 "CAPC_0603" CC0603 9.559,84.8 r90 top locked value=1uF
C29 "CAPC_0603" CC0603 58.164,111.7 r90 top locked value=0.1uF
C30 "CAPC_0603" CC0603 8.209,84.8 r90 top locked value=0.1uF
C31 "CAPC_0603" CC0603 57.059,126.7 r270 top locked value=1uF
C32 "CAPC_0603" CC0603 9.559,98.3 r90 top locked value=1uF
C33 "CAPC_0603" CC0603 58.164,126.7 r270 top locked value=0.1uF
C34 "CAPC_0603" CC0603 8.209,98.3 r90 top locked value=0.1uF
C35 "CAPC_0603" CC0603 56.959,112.2 r90 bottom value=1uF
C36 "CAPC_0603" CC0603 9.559,85.3 r90 bottom value=1uF
C37 "CAPC_0603" CC0603 58.164,112.2 r90 bottom value=0.1uF
C38 "CAPC_0603" CC0603 8.209,85.3 r90 bottom value=0.1uF
C39 "CAPC_0603" CC0603 57.059,127.2 r270 bottom value=1uF
C40 "CAPC_0603" CC0603 9.559,98.8 r90 bottom value=1uF
C41 "CAPC_0603" CC0603 58.164,127.2 r270 bottom value=0.1uF
C42 "CAPC_0603" CC0603 8.209,98.8 r90 bottom value=0.1uF
C43 "CAPC_0402" CC0402 63.634,100.075 r270 top locked value=0.1uF
C44 "CAPC_0402" CC0402 62.534,118.45 r0 bottom value=22nF
C45 "CAPC_0805" CC0805#1 62.675,120.425 r180 top locked value=10uF
C46 "CAPC_0805" CC0805#2 61.034,100.175 r180 top locked value=10uF
C47 "CAPC_0805" CC0805#2 65.434,120.15 r0 bottom value=10uF
C48 "CAPC_0402" CC0402 62.684,117.425 r0 top locked value=1uF
C49 "CAPC_0402" CC0402 59.809,117.527 r180 top locked value=0.1uF
C50 "CAPC_0402" CC0402 61.684,119.125 r180 top locked value=0.1uF
C51 "CAPC_0402" CC0402 63.234,115.65 r0 bottom value=22pF
C52 "CAPC_0402" CC0402 64.409,97.15 r0 top locked value=22pF
C53 "CAPC_0402" CC0402 64.884,116.325 r0 top locked value=2.2nF
C54 "CAPC_0402" CC0402 62.234,113.65 r180 bottom value=10uF
C55 "CAPC_0603" CC0603 65.759,99.4 r180 top locked value=10uF
C56 "CAPC_0603" CC0603 61.934,112.55 r0 bottom value=10uF
C57 "CAPC_0603" CC0603 65.759,98.2 r180 top locked value=10uF
C58 "CAPC_0402" CC0402 64.384,113.675 r90 top locked value=22pF
C59 "CAPC_0805" CC0805#2 65.184,102.925 r180 top locked value=22uF
C60 "CAPC_0603" CC0603 62.184,103.625 r270 top locked value=10uF
C61 "CAPC_0805" CC0805#2 65.184,104.725 r180 top locked value=10uF
C62 "CAPC_0603" CC0603 44.943,152.497 r270 bottom value=0.1uF (schematic designator C14)
C62_1 "CAPC_0603" CC0603 44.943,148.788 r90 bottom value=0.1uF (schematic designator C14)
C63 "CAPC_0603" CC0603 12.67,54.679 r270 bottom value=4.7uF
C64 "CAPC_0603" CC0603 38.016,41.847 r270 bottom value=2.2uF
C65 "CAPC_0402" CC0402 13.64,54.479 r90 bottom value=0.1uF
C66 "CAPC_0402" CC0402 61.859,76 r0 top locked value=1uF
C67 "CAPC_0402" CC0402 60.959,80.6 r180 top locked value=1uF
C68 "CAPC_0603" CC0603 43.401,152.497 r270 bottom value=0.1uF (schematic designator C14)
C68_1 "CAPC_0603" CC0603 43.401,148.788 r90 bottom value=0.1uF (schematic designator C14)
C69 "CAPC_0402" CC0402 36.22,41.679 r90 bottom value=0.1uF
C70 "CAPC_0402" CC0402 14.44,54.479 r90 bottom value=0.1uF
C71 "CAPC_0402" CC0402 37.02,41.679 r90 bottom value=0.1uF
C72 "CAPC_0402" CC0402 15.24,54.479 r90 bottom value=0.1uF
C73 "CAPC_0603" CC0603 42.44,46.858 r270 bottom value=4.7uF
C74 "CAPC_0603" CC0603 40.619,42.672 r270 bottom value=2.2uF
C75 "CAPC_0402" CC0402 43.44,45.579 r270 bottom value=0.1uF
C76 "CAPC_0402" CC0402 44.24,45.579 r270 bottom value=0.1uF
C77 "CAPC_0402" CC0402 42.519,42.497 r90 bottom value=0.1uF
C78 "CAPC_0402" CC0402 65.015,78.65 r270 top locked value=2.2uF
C79 "CAPC_0402" CC0402 65.015,83.55 r270 top locked value=2.2uF
C81 "CAPC_0402" CC0402 41.719,42.497 r90 bottom value=0.1uF
C82 "CAPC_0402" CC0402 45.04,45.579 r270 bottom value=0.1uF
D44 "Comment" BGA-288 32.04,46.579 r45 top locked
D50 "Comment" PLD2-2,54 9.898,74.597 r90 top
D51 "Comment" PLD2-2,54 56.234,74.597 r90 top
D52 "Comment" PLD2-2,54 56.234,69.516 r90 top
D53 "Comment" PLD2-2,54 56.234,64.436 r90 top
D54 "Comment" PLD2-2,54 56.234,59.358 r90 top
D55 "Comment" PLD3-2,54 3.156,80.087 r0 top
D78 "Comment" "BGA-132 (KZT)" 35.338,151.243 r90 top locked
DA1 "SY8030DEC" "DFN6 2X2mm 0.65pitch"#1 65.334,116.85 r180 bottom
DA2 "SY8030DEC" "DFN6 2X2mm 0.65pitch"#2 61.634,97.175 r0 top locked
DA3 "SY8047QDC" QFN-16(3X3) 61.784,114.925 r90 top locked
DA5 "S-1206B33" SOT-23-3 61.459,78.2 r0 top locked
DA6 "S-1206B18" SOT-23-3 61.459,83.1 r0 top locked
DD1 "NT5CB512" "BGA x16 96pin" 15.07,46.079 r180 bottom locked
DD2 "MT29F128G08CFAAAWP-ITZ:A" MT29F128G08CFAAAWP-ITZ:A 44.934,85.75 r180 top locked
DD3 "MT29F128G08CFAAAWP-ITZ:A" MT29F128G08CFAAAWP-ITZ:A 21.434,112.65 r180 top locked
DD4 "MT29F128G08CFAAAWP-ITZ:A" MT29F128G08CFAAAWP-ITZ:A 44.934,99.25 r180 top locked
DD5 "MT29F128G08CFAAAWP-ITZ:A" MT29F128G08CFAAAWP-ITZ:A 21.434,126.25 r180 top locked
DD6 "MT29F128G08CFAAAWP-ITZ:A" MT29F128G08CFAAAWP-ITZ:A 44.939,85.75 r180 bottom locked
DD7 "MT29F128G08CFAAAWP-ITZ:A" MT29F128G08CFAAAWP-ITZ:A 21.434,112.65 r180 bottom locked
DD8 "MT29F128G08CFAAAWP-ITZ:A" MT29F128G08CFAAAWP-ITZ:A 44.939,99.25 r180 bottom locked
DD9 "MT29F128G08CFAAAWP-ITZ:A" MT29F128G08CFAAAWP-ITZ:A 21.434,126.25 r180 bottom locked
DD10 "MT29F128G08CFAAAWP-ITZ:A" MT29F128G08CFAAAWP-ITZ:A 44.939,112.65 r180 top locked
DD11 "MT29F128G08CFAAAWP-ITZ:A" MT29F128G08CFAAAWP-ITZ:A 21.434,85.75 r180 top locked
DD12 "MT29F128G08CFAAAWP-ITZ:A" MT29F128G08CFAAAWP-ITZ:A 44.939,126.25 r180 top locked
DD13 "MT29F128G08CFAAAWP-ITZ:A" MT29F128G08CFAAAWP-ITZ:A 21.434,99.25 r180 top locked
DD14 "MT29F128G08CFAAAWP-ITZ:A" MT29F128G08CFAAAWP-ITZ:A 44.939,112.65 r180 bottom locked
DD15 "MT29F128G08CFAAAWP-ITZ:A" MT29F128G08CFAAAWP-ITZ:A 21.434,85.75 r180 bottom locked
DD16 "MT29F128G08CFAAAWP-ITZ:A" MT29F128G08CFAAAWP-ITZ:A 44.939,126.25 r180 bottom locked
DD17 "MT29F128G08CFAAAWP-ITZ:A" MT29F128G08CFAAAWP-ITZ:A 21.434,99.25 r180 bottom locked
DD18 "SM2246EN" BGA288C65P17X17_1205X1205X135 32.04,46.579 r135 top locked
L1 "Power Inductor-2512" IND2512#1 65.934,114.95 r0 bottom value=2.2uH
L2 "Power Inductor-2512" IND2512#2 60.484,95.7 r270 top locked value=2.2uH
L3 "Power Inductor" IND4012 62.884,108.425 r0 top locked value=1uH
L4 "BEAD" INDC2012L 61.434,110.35 r180 bottom value=120Ohm
R1 "RESC_0402" RR0402 19.965,37.834 r90 bottom value="100 1%"
R2 "RESC_0402" RR0402 8.835,43.673 r0 bottom value="240 1%"
R3 "RESC_0402" RR0402 8.318,39.398 r225 top value="1k 1%"
R4 "RESC_0402" RR0402 7.626,40.126 r45 top value="1k 1%"
R9 "RESC_0402" RR0402 59.659,78 r270 top locked value=0
R10 "RESC_0402" RR0402 32.959,42.879 r90 bottom value=0
R11 "RESC_0402" RR0402 34.44,42.969 r45 bottom value=0
R12 "RESC_0402" RR0402 37.368,37.691 r315 bottom value=0
R13 "RESC_0402" RR0402 39.92,36.58 r135 bottom value=0
R14 "RESC_0402" RR0402 34.111,39.045 r180 bottom value=1M
R15 "RESC_0402" RR0402 40.573,37.263 r315 bottom value=0
R16 "RESC_0402" RR0402 38.483,35.218 r315 bottom value=10k
R17 "RESC_0402" RR0402 46.571,151.768 r180 bottom value=0 (schematic designator R9)
R18 "RESC_0402" RR0402 35.177,37.582 r90 bottom value="100 1%"
R19 "RESC_0402" RR0402 38.155,38.481 r315 bottom value=0
R20 "RESC_0402" RR0402 33.419,45.737 r315 bottom value=0
R21 "RESC_0402" RR0402 47.416,46.083 r45 bottom value=NC
R22 "RESC_0402" RR0402 37.911,44.116 r270 bottom value=33k
R23 "RESC_0402" RR0402 50.249,19.64 r90 top value=100
R24 "RESC_0402" RR0402 48.53,19.64 r90 top value=100
R25 "RESC_0402" RR0402 57.959,89.4 r90 top locked value=10K
R26 "RESC_0402" RR0402 57.159,89.4 r90 top locked value=2K
R27 "RESC_0402" RR0402 23.72,44.619 r90 bottom value="240 1%"
R28 "RESC_0402" RR0402 31.463,40.047 r315 bottom value="200 1%"
R29 "RESC_0402" RR0402 61.634,117.55 r180 bottom value=51k
R30 "RESC_0402" RR0402 62.934,100.075 r90 top locked value=150k
R31 "RESC_0402" RR0402 63.032,117.05 r90 bottom value=51k
R32 "RESC_0402" RR0402 64.684,115.15 r90 bottom value=100k
R33 "RESC_0402" RR0402 62.234,95.875 r270 top locked value=100k
R34 "RESC_0402" RR0402 61.684,118.325 r0 top locked value=10
R35 "RESC_0402" RR0402 59.809,118.325 r0 top locked value=51k
R36 "RESC_0402" RR0402 63.734,112.15 r90 bottom value=118k
R37 "RESC_0402" RR0402 63.234,114.65 r180 bottom value=39.2k
R38 "RESC_0402" RR0402 64.234,113.65 r180 bottom value=59k
R39 "RESC_0402" RR0402 64.409,96.375 r180 top locked value="59k 1%"
R40 "RESC_0402" RR0402 62.959,95.875 r270 top locked value="39k 1%"
R41 "RESC_0402" RR0402 63.034,112.225 r0 top locked value=150k
R42 "RESC_0402" RR0402 65.559,100.65 r0 top locked value=0
R43 "RESC_0402" RR0402 65.184,113.675 r270 top locked value=267k
R44 "RESC_0402" RR0402 65.684,115.425 r0 top locked value=59k
R45 "RESC_0402" RR0402 59.984,102.925 r180 top locked value=0
R46 "RESC_0402" RR0402 26.823,136.506 r90 bottom value=0 (schematic designator R15)
R47 "RESC_0402" RR0402 27.682,136.506 r90 bottom value=0 (schematic designator R15)
R48 "RESC_0402" RR0402 29.774,136.506 r90 bottom value=0 (schematic designator R15)
R49 "RESC_0402" RR0402 66.059,78.65 r270 top locked value=0
R50 "RESC_0402" RR0402 66.559,84.05 r0 top locked value=0
R51 "RESC_0402" RR0402 28.914,136.506 r90 bottom value=0 (schematic designator R15)
S1 "DIP Switch 3" "DIP-3 SMD" 65.279,101.86 r180 bottom
SW2 "Comment" KLS7-TS3401 48.387,71.29 r90 top
VD1 "Diod Schottky" "Diode Schottky" 38.74,40.91 r90 bottom
VD2 "LED 0603" "Led 0603" 50.249,16.174 r90 top
VD3 "LED 0603" "Led 0603" 48.53,16.174 r90 top
VD4 "SS2040FL" SOD-123 61.925,123.725 r90 top locked
VT1 "MOS-N" SOT-23_M 65.534,110.175 r90 bottom
X1 "SATA" 5622-6309-ML 58.134,8.098 r180 top

## Footprints (in the part's own frame and the unit in brackets; to place one, negate y for a bottom-side part, rotate by r counter-clockwise, add the part's x,y. Pads: shape width x height; smd on the part's side, far side on the other; paste and mask are expansions set on the pad)
5622-6309-ML [mm]
  rect 0.95x2.5 smd mask+0.05: 1(31.75,0) 2(30.48,0) 3(29.21,0) 4(27.94,0) 5(26.67,0) 6(25.4,0) 7(24.13,0) 8(17.78,0) 9(16.51,0) 10(15.24,0) 11(13.97,0) 12(12.7,0) 13(11.43,0) 14(10.16,0) 15(8.89,0) 16(7.62,0) 17(6.35,0) 18(5.08,0) 19(3.81,0) 20(2.54,0) 21(1.27,0) 22(0,0)
  body extent -6.96,-1.66 38.8,10.34, height 3.7
BGA288C65P17X17_1205X1205X135 [mm] "BGA, 288-Leads, Body 12.05x12.05mmx1.35mm, Pitch 0.65mm"
  round 0.3 smd mask+0.05: A2(-4.55,5.2) A3(-3.9,5.2) A4(-3.25,5.2) A5(-2.6,5.2) A6(-1.95,5.2) A7(-1.3,5.2) A8(-0.65,5.2) A9(0,5.2) A10(0.65,5.2) A11(1.3,5.2) A12(1.95,5.2) A13(2.6,5.2) A14(3.25,5.2) A15(3.9,5.2) A16(4.55,5.2) A17(5.2,5.2) B1(-5.2,4.55) B2(-4.55,4.55) B3(-3.9,4.55) B4(-3.25,4.55) B5(-2.6,4.55) B6(-1.95,4.55) B7(-1.3,4.55) B8(-0.65,4.55) B9(0,4.55) B10(0.65,4.55) B11(1.3,4.55) B12(1.95,4.55) B13(2.6,4.55) B14(3.25,4.55) B15(3.9,4.55) B16(4.55,4.55) B17(5.2,4.55) C1(-5.2,3.9) C2(-4.55,3.9) C3(-3.9,3.9) C4(-3.25,3.9) C5(-2.6,3.9) C6(-1.95,3.9) C7(-1.3,3.9) C8(-0.65,3.9) C9(0,3.9) C10(0.65,3.9) C11(1.3,3.9) C12(1.95,3.9) C13(2.6,3.9) C14(3.25,3.9) C15(3.9,3.9) C16(4.55,3.9) C17(5.2,3.9) D1(-5.2,3.25) D2(-4.55,3.25) D3(-3.9,3.25) D4(-3.25,3.25) D5(-2.6,3.25) D6(-1.95,3.25) D7(-1.3,3.25) D8(-0.65,3.25) D9(0,3.25) D10(0.65,3.25) D11(1.3,3.25) D12(1.95,3.25) D13(2.6,3.25) D14(3.25,3.25) D15(3.9,3.25) D16(4.55,3.25) D17(5.2,3.25) E1(-5.2,2.6) E2(-4.55,2.6) E3(-3.9,2.6) E4(-3.25,2.6) E5(-2.6,2.6) E6(-1.95,2.6) E7(-1.3,2.6) E8(-0.65,2.6) E9(0,2.6) E10(0.65,2.6) E11(1.3,2.6) E12(1.95,2.6) E13(2.6,2.6) E14(3.25,2.6) E15(3.9,2.6) E16(4.55,2.6) E17(5.2,2.6) F1(-5.2,1.95) F2(-4.55,1.95) F3(-3.9,1.95) F4(-3.25,1.95) F5(-2.6,1.95) F6(-1.95,1.95) F7(-1.3,1.95) F8(-0.65,1.95) F9(0,1.95) F10(0.65,1.95) F11(1.3,1.95) F12(1.95,1.95) F13(2.6,1.95) F14(3.25,1.95) F15(3.9,1.95) F16(4.55,1.95) F17(5.2,1.95) G1(-5.2,1.3) G2(-4.55,1.3) G3(-3.9,1.3) G4(-3.25,1.3) G5(-2.6,1.3) G6(-1.95,1.3) G7(-1.3,1.3) G8(-0.65,1.3) G9(0,1.3) G10(0.65,1.3) G11(1.3,1.3) G12(1.95,1.3) G13(2.6,1.3) G14(3.25,1.3) G15(3.9,1.3) G16(4.55,1.3) G17(5.2,1.3) H1(-5.2,0.65) H2(-4.55,0.65) H3(-3.9,0.65) H4(-3.25,0.65) H5(-2.6,0.65) H6(-1.95,0.65) H7(-1.3,0.65) H8(-0.65,0.65) H9(0,0.65) H10(0.65,0.65) H11(1.3,0.65) H12(1.95,0.65) H13(2.6,0.65) H14(3.25,0.65) H15(3.9,0.65) H16(4.55,0.65) H17(5.2,0.65) J1(-5.2,0) J2(-4.55,0) J3(-3.9,0) J4(-3.25,0) J5(-2.6,0) J6(-1.95,0) J7(-1.3,0) J8(-0.65,0) J9(0,0) J10(0.65,0) J11(1.3,0) J12(1.95,0) J13(2.6,0) J14(3.25,0) J15(3.9,0) J16(4.55,0) J17(5.2,0) K1(-5.2,-0.65) K2(-4.55,-0.65) K3(-3.9,-0.65) K4(-3.25,-0.65) K5(-2.6,-0.65) K6(-1.95,-0.65) K7(-1.3,-0.65) K8(-0.65,-0.65) K9(0,-0.65) K10(0.65,-0.65) K11(1.3,-0.65) K12(1.95,-0.65) K13(2.6,-0.65) K14(3.25,-0.65) K15(3.9,-0.65) K16(4.55,-0.65) K17(5.2,-0.65) L1(-5.2,-1.3) L2(-4.55,-1.3) L3(-3.9,-1.3) L4(-3.25,-1.3) L5(-2.6,-1.3) L6(-1.95,-1.3) L7(-1.3,-1.3) L8(-0.65,-1.3) L9(0,-1.3) L10(0.65,-1.3) L11(1.3,-1.3) L12(1.95,-1.3) L13(2.6,-1.3) L14(3.25,-1.3) L15(3.9,-1.3) L16(4.55,-1.3) L17(5.2,-1.3) M1(-5.2,-1.95) M2(-4.55,-1.95) M3(-3.9,-1.95) M4(-3.25,-1.95) M5(-2.6,-1.95) M6(-1.95,-1.95) M7(-1.3,-1.95) M8(-0.65,-1.95) M9(0,-1.95) M10(0.65,-1.95) M11(1.3,-1.95) M12(1.95,-1.95) M13(2.6,-1.95) M14(3.25,-1.95) M15(3.9,-1.95) M16(4.55,-1.95) M17(5.2,-1.95) N1(-5.2,-2.6) N2(-4.55,-2.6) N3(-3.9,-2.6) N4(-3.25,-2.6) N5(-2.6,-2.6) N6(-1.95,-2.6) N7(-1.3,-2.6) N8(-0.65,-2.6) N9(0,-2.6) N10(0.65,-2.6) N11(1.3,-2.6) N12(1.95,-2.6) N13(2.6,-2.6) N14(3.25,-2.6) N15(3.9,-2.6) N16(4.55,-2.6) N17(5.2,-2.6) P1(-5.2,-3.25) P2(-4.55,-3.25) P3(-3.9,-3.25) P4(-3.25,-3.25) P5(-2.6,-3.25) P6(-1.95,-3.25) P7(-1.3,-3.25) P8(-0.65,-3.25) P9(0,-3.25) P10(0.65,-3.25) P11(1.3,-3.25) P12(1.95,-3.25) P13(2.6,-3.25) P14(3.25,-3.25) P15(3.9,-3.25) P16(4.55,-3.25) P17(5.2,-3.25) R1(-5.2,-3.9) R2(-4.55,-3.9) R3(-3.9,-3.9) R4(-3.25,-3.9) R5(-2.6,-3.9) R6(-1.95,-3.9) R7(-1.3,-3.9) R8(-0.65,-3.9) R9(0,-3.9) R10(0.65,-3.9) R11(1.3,-3.9) R12(1.95,-3.9) R13(2.6,-3.9) R14(3.25,-3.9) R15(3.9,-3.9) R16(4.55,-3.9) R17(5.2,-3.9) T1(-5.2,-4.55) T2(-4.55,-4.55) T3(-3.9,-4.55) T4(-3.25,-4.55) T5(-2.6,-4.55) T6(-1.95,-4.55) T7(-1.3,-4.55) T8(-0.65,-4.55) T9(0,-4.55) T10(0.65,-4.55) T11(1.3,-4.55) T12(1.95,-4.55) T13(2.6,-4.55) T14(3.25,-4.55) T15(3.9,-4.55) T16(4.55,-4.55) T17(5.2,-4.55) U1(-5.2,-5.2) U2(-4.55,-5.2) U3(-3.9,-5.2) U4(-3.25,-5.2) U5(-2.6,-5.2) U6(-1.95,-5.2) U7(-1.3,-5.2) U8(-0.65,-5.2) U9(0,-5.2) U10(0.65,-5.2) U11(1.3,-5.2) U12(1.95,-5.2) U13(2.6,-5.2) U14(3.25,-5.2) U15(3.9,-5.2) U16(4.55,-5.2) U17(5.2,-5.2)
  silkscreen extent -6.8,5.75 -6.55,6, body extent -6.02,-6.03 6.03,6.02, height 1.35
"BGA x16 96pin" [mm]
  round 0.45 smd mask+0.05: A1(-3.2,6) A2(-2.4,6) A3(-1.6,6) A7(1.6,6) A8(2.4,6) A9(3.2,6) B1(-3.2,5.2) B2(-2.4,5.2) B3(-1.6,5.2) B7(1.6,5.2) B8(2.4,5.2) B9(3.2,5.2) C1(-3.2,4.4) C2(-2.4,4.4) C3(-1.6,4.4) C7(1.6,4.4) C8(2.4,4.4) C9(3.2,4.4) D1(-3.2,3.6) D2(-2.4,3.6) D3(-1.6,3.6) D7(1.6,3.6) D8(2.4,3.6) D9(3.2,3.6) E1(-3.2,2.8) E2(-2.4,2.8) E3(-1.6,2.8) E7(1.6,2.8) E8(2.4,2.8) E9(3.2,2.8) F1(-3.2,2) F2(-2.4,2) F3(-1.6,2) F7(1.6,2) F8(2.4,2) F9(3.2,2) G1(-3.2,1.2) G2(-2.4,1.2) G3(-1.6,1.2) G7(1.6,1.2) G8(2.4,1.2) G9(3.2,1.2) H1(-3.2,0.4) H2(-2.4,0.4) H3(-1.6,0.4) H7(1.6,0.4) H8(2.4,0.4) H9(3.2,0.4) J1(-3.2,-0.4) J2(-2.4,-0.4) J3(-1.6,-0.4) J7(1.6,-0.4) J8(2.4,-0.4) J9(3.2,-0.4) K1(-3.2,-1.2) K2(-2.4,-1.2) K3(-1.6,-1.2) K7(1.6,-1.2) K8(2.4,-1.2) K9(3.2,-1.2) L1(-3.2,-2) L2(-2.4,-2) L3(-1.6,-2) L7(1.6,-2) L8(2.4,-2) L9(3.2,-2) M1(-3.2,-2.8) M2(-2.4,-2.8) M3(-1.6,-2.8) M7(1.6,-2.8) M8(2.4,-2.8) M9(3.2,-2.8) N1(-3.2,-3.6) N2(-2.4,-3.6) N3(-1.6,-3.6) N7(1.6,-3.6) N8(2.4,-3.6) N9(3.2,-3.6) P1(-3.2,-4.4) P2(-2.4,-4.4) P3(-1.6,-4.4) P7(1.6,-4.4) P8(2.4,-4.4) P9(3.2,-4.4) R1(-3.2,-5.2) R2(-2.4,-5.2) R3(-1.6,-5.2) R7(1.6,-5.2) R8(2.4,-5.2) R9(3.2,-5.2) T1(-3.2,-6) T2(-2.4,-6) T3(-1.6,-6) T7(1.6,-6) T8(2.4,-6) T9(3.2,-6)
  silkscreen extent -4.84,6.59 -4.59,6.83, body extent -4.5,-6.48 4.5,6.52, height 1.19
"BGA-132 (KZT)" [mm]
  round 1.2 hole 2.2 unplated: 0(-12.85,0) 0(-12.5,20.5) 0(-12.5,-20.5) 0(12.5,20.5) 0(12.5,-20.5) 0(12.85,0)
  round 1.2 hole 1.7 unplated: 0(-7.63,9.32)
  round 1.2 hole 2.1 unplated: 0(7.37,-9.57)
  round 0.55 smd: A1(7.75,5.25) A2(7.75,4.25) A3(7.75,3.25) A9(7.75,-2.75) A10(7.75,-3.75) A11(7.75,-4.75) B1(6.75,5.25) B2(6.75,4.25) B3(6.75,3.25) B9(6.75,-2.75) B10(6.75,-3.75) B11(6.75,-4.75) C1(5.75,5.25) C2(5.75,4.25) C3(5.75,3.25) C9(5.75,-2.75) C10(5.75,-3.75) C11(5.75,-4.75) D1(4.75,5.25) D2(4.75,4.25) D3(4.75,3.25) D4(4.75,2.25) D5(4.75,1.25) D7(4.75,-0.75) D8(4.75,-1.75) D9(4.75,-2.75) D10(4.75,-3.75) D11(4.75,-4.75) E1(3.75,5.25) E2(3.75,4.25) E3(3.75,3.25) E4(3.75,2.25) E5(3.75,1.25) E7(3.75,-0.75) E8(3.75,-1.75) E9(3.75,-2.75) E10(3.75,-3.75) E11(3.75,-4.75) F2(2.75,4.25) F3(2.75,3.25) F4(2.75,2.25) F5(2.75,1.25) F7(2.75,-0.75) F8(2.75,-1.75) F9(2.75,-2.75) F10(2.75,-3.75) G2(1.75,4.25) G3(1.75,3.25) G4(1.75,2.25) G5(1.75,1.25) G7(1.75,-0.75) G8(1.75,-1.75) G9(1.75,-2.75) G10(1.75,-3.75) H2(0.75,4.25) H3(0.75,3.25) H4(0.75,2.25) H5(0.75,1.25) H7(0.75,-0.75) H8(0.75,-1.75) H9(0.75,-2.75) H10(0.75,-3.75) J2(-0.25,4.25) J3(-0.25,3.25) J4(-0.25,2.25) J5(-0.25,1.25) J7(-0.25,-0.75) J8(-0.25,-1.75) J9(-0.25,-2.75) J10(-0.25,-3.75) K2(-1.25,4.25) K3(-1.25,3.25) K4(-1.25,2.25) K5(-1.25,1.25) K7(-1.25,-0.75) K8(-1.25,-1.75) K9(-1.25,-2.75) K10(-1.25,-3.75) L2(-2.25,4.25) L3(-2.25,3.25) L4(-2.25,2.25) L5(-2.25,1.25) L7(-2.25,-0.75) L8(-2.25,-1.75) L9(-2.25,-2.75) L10(-2.25,-3.75) M2(-3.25,4.25) M3(-3.25,3.25) M4(-3.25,2.25) M5(-3.25,1.25) M7(-3.25,-0.75) M8(-3.25,-1.75) M9(-3.25,-2.75) M10(-3.25,-3.75) N1(-4.25,5.25) N2(-4.25,4.25) N3(-4.25,3.25) N4(-4.25,2.25) N5(-4.25,1.25) N7(-4.25,-0.75) N8(-4.25,-1.75) N9(-4.25,-2.75) N10(-4.25,-3.75) N11(-4.25,-4.75) P1(-5.25,5.25) P2(-5.25,4.25) P3(-5.25,3.25) P4(-5.25,2.25) P5(-5.25,1.25) P7(-5.25,-0.75) P8(-5.25,-1.75) P9(-5.25,-2.75) P10(-5.25,-3.75) P11(-5.25,-4.75) R1(-6.25,5.25) R2(-6.25,4.25) R3(-6.25,3.25) R9(-6.25,-2.75) R10(-6.25,-3.75) R11(-6.25,-4.75) T1(-7.25,5.25) T2(-7.25,4.25) T3(-7.25,3.25) T9(-7.25,-2.75) T10(-7.25,-3.75) T11(-7.25,-4.75) U1(-8.25,5.25) U2(-8.25,4.25) U3(-8.25,3.25) U9(-8.25,-2.75) U10(-8.25,-3.75) U11(-8.25,-4.75)
  silkscreen extent -15.5,-23.5 15.5,23.5
BGA-288 [mm]
  round 1.2 hole 2.2 unplated: 0(-18,-18.3) 0(-18,18.3) 0(18,-18.3) 0(18,18.3)
  round 1.2 hole 1.5 unplated: 0(-18,-14)
  round 1.2 hole 2 unplated: 0(18,14)
  silkscreen extent -20,-25 20,25
CC0402 [mm]
  rrect60% 0.6x0.5 smd mask+0.05: 1(-0.5,0) 2(0.5,0)
  body extent -0.5,-0.3 0.5,0.3, height 0.2
CC0603 [mm]
  rrect60% 0.8x0.9 smd mask+0.05: 1(-0.7,0) 2(0.7,0)
  body extent -0.8,-0.4 0.8,0.4, height 0.3
CC0805#1 [mm]
  rrect60% 1.1x1.4 smd mask+0.05: 1(-0.75,0) 2(0.75,0)
  body extent -1,-0.62 1,0.63, height 0.78
CC0805#2 [mm]
  rrect60% 1.1x1.4 smd: 1(-0.75,0) 2(0.75,0)
  body extent -1,-0.62 1,0.63, height 0.78
"DFN6 2X2mm 0.65pitch"#1 [mm]
  rect 0.35x0.4 smd mask+0.07: 1(0,0) 2(0.65,0) 3(1.3,0) 4(1.3,1.6) 5(0.65,1.6) 6(0,1.6)
  rect 1.45x0.85 smd mask+0.11: 7(0.65,0.8)
  silkscreen extent -0.96,-0.06 -0.74,0.16, body extent -0.35,-0.2 1.65,1.8, height 0.75
"DFN6 2X2mm 0.65pitch"#2 [mm]
  rect 0.35x0.4 smd mask+0.08: 1(0,0) 2(0.65,0) 3(1.3,0) 4(1.3,1.6) 5(0.65,1.6) 6(0,1.6)
  rect 1.45x0.85 smd mask+0.1: 7(0.65,0.8)
  silkscreen extent -0.92,-0.02 -0.78,0.12, body extent -0.35,-0.2 1.65,1.8, height 0.75
"Diode Schottky" [mm]
  rect 0.65x0.4 smd: 1(0.25,0.5) 2(1.725,0.5)
  silkscreen extent -0.44,0 2.33,1, body extent 0.2,0.1 1.8,0.9, height 0.7
"DIP-3 SMD" [mm]
  rect 0.76x1.27 smd: 1(-1.27,3.81) 2(-1.27,-3.81) 3(0,3.81) 4(0,-3.81) 5(1.27,3.81) 6(1.27,-3.81)
  silkscreen extent -2.4,3.6 -2,4, body extent -2.54,-3.49 2.5,3.49, height 1.55
IND2512#1 [mm]
  rect 0.9x2.1 smd: 1(0,0) 2(1.7,0)
  body extent -0.54,-1.14 2.25,1.14, height 1.26
IND2512#2 [mm]
  rect 0.9x2.1 smd mask+0.05: 1(0,0) 2(1.7,0)
  body extent -0.55,-1.14 2.25,1.14, height 1.26
IND4012 [mm]
  rect 1.73x4.22 smd: 1(-1.84,0) 2(1.84,0)
  body extent -2.35,-2.1 2.35,2.1, height 1.2
INDC2012L [mm] "Chip Inductor, Body 2.0x1.2mm, IPC High Density"
  rect 1.2x1.4 smd: 1(-0.8,0) 2(0.8,0)
  body extent -1.1,-0.7 1.1,0.7, height 1.1
KLS7-TS3401 [mm]
  rect 0.7x1.5 smd: 1(1.075,2.025) 2(-1.075,2.025) 3(-1.075,-2.025) 4(1.075,-2.025)
  silkscreen extent -0.8,-2.1 0.8,2.1
KX-4T [mm] "Crystal"
  rect 0.55x0.45 smd mask+0.05: 1(-0.525,-0.375)
  rrect50% 0.55x0.45 smd mask+0.05: 2(0.525,-0.375) 3(0.525,0.375) 4(-0.525,0.375)
  body extent -0.8,-0.6 0.8,0.6, height 0.36
"Led 0603" [mm]
  rect 0.8x0.8 smd: 1(0,0) 2(1.5,0)
  silkscreen extent -0.73,-0.63 2.2,0.63, body extent -0.1,-0.4 1.5,0.4, height 0.62
MT29F128G08CFAAAWP-ITZ:A [mm]
  oval 1.25x0.3 smd: 1(-9.875,5.75) 2(-9.875,5.25) 3(-9.875,4.75) 4(-9.875,4.25) 5(-9.875,3.75) 6(-9.875,3.25) 7(-9.875,2.75) 8(-9.875,2.25) 9(-9.875,1.75) 10(-9.875,1.25) 11(-9.875,0.75) 12(-9.875,0.25) 13(-9.875,-0.25) 14(-9.875,-0.75) 15(-9.875,-1.25) 16(-9.875,-1.75) 17(-9.875,-2.25) 18(-9.875,-2.75) 19(-9.875,-3.25) 20(-9.875,-3.75) 21(-9.875,-4.25) 22(-9.875,-4.75) 23(-9.875,-5.25) 24(-9.875,-5.75) 25(9.875,-5.75) 26(9.875,-5.25) 27(9.875,-4.75) 28(9.875,-4.25) 29(9.875,-3.75) 30(9.875,-3.25) 31(9.875,-2.75) 32(9.875,-2.25) 33(9.875,-1.75) 34(9.875,-1.25) 35(9.875,-0.75) 36(9.875,-0.25) 37(9.875,0.25) 38(9.875,0.75) 39(9.875,1.25) 40(9.875,1.75) 41(9.875,2.25) 42(9.875,2.75) 43(9.875,3.25) 44(9.875,3.75) 45(9.875,4.25) 46(9.875,4.75) 47(9.875,5.25) 48(9.875,5.75)
  silkscreen extent -10,6.33 -9.75,6.57, body extent -10,-6.05 10,6.05, height 1.2
PLD2-2,54 [mm]
  round 1.8 hole 1: 1(-1.27,0) 2(1.27,0)
  silkscreen extent -2.54,-1.27 2.54,1.27
PLD3-2,54 [mm]
  round 1.8 hole 1: 1(0,-0.01) 2(2.54,-0.01) 3(5.08,-0.01)
  silkscreen extent -1.27,-1.28 6.35,1.26
QFN-16(3X3) [mm]
  rect 0.6x0.24 smd mask+0.05: 1(-1.425,0.775) 2(-1.425,0.275) 3(-1.425,-0.225) 4(-1.425,-0.725) 9(1.425,-0.725) 10(1.425,-0.225) 11(1.425,0.275) 12(1.425,0.775)
  rect 0.24x0.6 smd mask+0.05: 5(-0.75,-1.4) 6(-0.25,-1.4) 7(0.25,-1.4) 8(0.75,-1.4) 13(0.75,1.45) 14(0.25,1.45) 15(-0.25,1.45) 16(-0.75,1.45)
  rect 1.6x1.6 smd mask+0.05: 17(0,0.025)
  silkscreen extent -1.47,1.32 -1.28,1.52, body extent -1.5,-1.48 1.5,1.53, height 0.9
RR0402 [mm]
  rrect60% 0.6x0.5 smd mask+0.05: 1(-0.5,0) 2(0.5,0)
  body extent -0.5,-0.3 0.5,0.3, height 0.2
SOD-123 [mm] "SODFL, 2-Leads, Body 1.80x3.60mm, IPC Medium Density"
  rect 1.15x1.1 smd: 1(-1.525,0) 2(1.525,0)
  body extent -1.48,-0.98 1.48,0.97, height 1.08
SOT-23-3 [mm]
  rect 1.45x0.6 smd: 1(0,0) 2(2,-0.95) 3(2,0.95)
  body extent -0.15,-1.43 2.15,1.43, height 1
SOT-23_M [mm] "SOT23, 3-Leads, Body 2.9x1.3mm, Pitch 0.95mm, Lead Span 2.5mm, IPC Low Density"
  rect 1.45x0.6 smd: 1(-1.175,0.95) 2(-1.175,-0.95) 3(1.175,0)
  silkscreen extent -1.3,1.68 -1.05,1.93, body extent -0.7,-1.5 0.7,1.5, height 1.1

## Part data
C1 C2 C3 C4 C5 C6 C7 C8 C9 C10 C43 C44 C48 C49 C50 C51 C52 C53 C54 C58 C65 C66 C67 C69 C70 C71 C72 C75 C76 C77 C78 C79 C81 C82: "Capacitor 0402"
C11 C12 C13 C14 C15 C16 C17 C18 C19 C20 C21 C22 C23 C24 C25 C26 C27 C28 C29 C30 C31 C32 C33 C34 C35 C36 C37 C38 C39 C40 C41 C42 C55 C56 C57 C60 C62 C62_1 C63 C64 C68 C68_1 C73 C74: "Capacitor 0603"
C45 C46 C47 C59 C61: "Capacitor 0805"
DA6: library part S-1206B33
L3: "GSTD4012PJ-1R0M"
L4: library part INDC-0805, "Chip Inductor, Body Body 2.0x1.2mm"
R1 R2 R3 R4 R9 R10 R11 R12 R13 R14 R15 R16 R17 R18 R19 R20 R21 R22 R23 R24 R25 R26 R27 R28 R29 R30 R31 R32 R33 R34 R35 R36 R37 R38 R39 R40 R41 R42 R43 R44 R45 R46 R47 R48 R49 R50 R51: "Resistor 0402"
VT1: library part ACE2302BBM+H
X1: "5622-6309-ML", URL=https://www.digikey.com/product-detail/en/3m/5622-6309-ML/3M5555-ND/1207097
BQ1: Package=https://www.yoketant.com.tw/yoketant/page42_pic.htm, Unit="SMD Crystal"
VD1: Name=BAT30KFILM

## Free pads (board coordinates)
  round 5 hole 3.4: MH(5,5) MH(5,67.5) MH(5,130) MH(5,165) MH(65,67.5) MH(65,130) MH(65,165) MH(65.002,15.263)

## Via types
v1: diameter 0.35, hole 0.15, L1:Top to L8:Bot, tented both sides, 722 vias
v2: diameter 0.6, hole 0.3, L1:Top to L8:Bot, tented both sides, 45 vias
v3: diameter 0.6, hole 0.3, L1:Top to L8:Bot, tented bottom, 4 vias

## Nets (pads, with @x,y where several pads share a name; then routed paths per layer and width w, separated by ;. In a path a pad name is that pad's centre, name@x,y a point inside that pad or via, vN(x,y) a via of type N, cw(c..) or ccw(c..) an arc to the next point about the centre after c; other vN are vias at no path point)
+3V3: S1.5
+5V: VD4.2 X1.14 X1.15 X1.16
  other v2: 47.954,9.798 49.204,9.798 50.454,9.798 48.554,10.498 49.854,10.498 64.275,124.534 65.375,124.559 64.275,125.709 65.375,125.709
  other v3: 64.825,125.134
+M3V3: S1.6
A0: DD1.N3 DD18.D10 | length 23.9
  L1:Top w0.1: v1(28.822,44.741) DD18.D10@29.282,44.741
  L5:Sig w0.1: v1(15.852,40.43) 16.086,40.43 cw(c16.086,39.865) 16.486,40.265 ; 16.486,40.265 16.757,39.993 cw(c16.42,39.656) 16.897,39.656 16.897,39.491 ccw(c17.099,39.491) 17.099,39.289 ; 17.114,39.289 ccw(c17.114,39.527) 17.353,39.527 17.353,39.677 17.356,39.677 cw(c17.558,39.677) 17.558,39.879 ; 17.574,39.879 cw(c17.574,39.64) 17.812,39.64 17.812,39.491 ; 17.814,39.491 ccw(c18.016,39.491) 18.016,39.289 ; 18.031,39.289 ccw(c18.031,39.527) 18.27,39.527 18.27,39.628 cw(c18.553,39.628) 18.553,39.912 19.003,39.912 cw(c19.003,39.712) 19.203,39.712 19.203,39.461 ccw(c19.403,39.461) 19.603,39.461 19.603,40.361 cw(c19.803,40.361) 20.003,40.361 20.003,39.461 ccw(c20.203,39.461) 20.403,39.461 20.403,40.361 cw(c20.603,40.361) 20.803,40.361 20.803,40.112 ccw(c21.003,40.112) 21.003,39.912 21.291,39.912 23.123,39.912 ccw(c23.123,40.902) 23.401,39.951 ccw(c23.123,40.902) 23.824,40.202 28.363,44.741 v1(28.822,44.741)
  L8:Bot w0.1: v1(15.852,40.43) 15.852,41.281 cw(c16.77,41.281) 16.121,41.93 DD1.N3@16.67,42.479
A1: DD1.P7 DD18.A13 | length 23.9
  L1:Top w0.1: v1(26.065,44.741) DD18.A13@26.524,44.741
  L3:Sig w0.1: v1(13.877,42.004) 13.877,42.989 cw(c14.085,42.989) 14.085,43.197 14.317,43.197 cw(c14.317,42.983) 14.532,42.983 14.532,39.614 ccw(c14.876,39.614) 14.876,39.27 ccw(c14.876,39.614) 15.22,39.614 15.22,40.608 cw(c15.455,40.608) 15.455,40.843 16.22,40.843 ccw(c16.22,41.243) 16.62,41.243 16.62,42.118 cw(c17.048,42.118) 17.048,42.546 19.274,42.546 19.324,42.546 ccw(c19.324,42.746) 19.524,42.746 19.524,43.445 cw(c19.724,43.445) 19.924,43.445 19.924,42.746 ccw(c20.124,42.746) 20.124,42.546 21.126,42.546 24.44,42.546 ccw(c24.44,43.554) 25.153,42.841 25.905,43.593 ccw(c25.518,43.979) 26.065,43.979 v1(26.065,44.741)
  L8:Bot w0.1: DD1.P7@13.47,41.679 v1(13.877,42.004)
A1V2: C74.2 C77.1 C81.1 D54.1 D54.2 DD18.C1 DD18.C4 DD18.C5 DD18.D1 L4.2 | length 103.2
  L1:Top w0.25: DD18.C5@31.12,41.983 v1(31.58,41.983) DD18.C4@31.58,41.524 ; DD18.C1@32.959,40.145 v1(33.419,40.145) DD18.D1@33.419,40.604
  L5:Sig w0.25: v1(31.58,41.983) ccw(c31.58,41.524) 31.12,41.524 31.12,40.766 ccw(c31.741,40.766) 31.741,40.145 v1(33.419,40.145)
  L5:Sig w0.3: v2(43.309,42.008) 43.309,41.933 43.341,41.966 44.662,41.966 56.278,53.581 D54.1@56.278,58.182 ; D54.2@56.268,60.299 56.415,60.447 58.017,62.048 58.017,65.804 59.795,67.583 69.059,76.846 69.059,107.5 68.097,108.463 v3(58.921,108.463) v2(58.921,109.306)
  L8:Bot w0.25: v1(33.419,40.145) 33.618,40.344 39.454,40.344 40.481,41.37 40.481,41.757 40.728,42.004 v2@43.309,42.004
A2: DD1.P3 DD18.B13 | length 23.9
  L1:Top w0.1: v1(26.524,45.201) DD18.B13@26.984,45.201
  L3:Sig w0.1: v1(16.272,41.281) 15.336,41.281 cw(c15.336,41.597) 15.02,41.597 15.02,42.954 cw(c15.309,42.954) 15.309,43.243 17.405,43.243 ccw(c17.405,43.475) 17.637,43.475 17.637,43.672 cw(c17.877,43.672) 17.877,43.912 20.72,43.912 21.17,43.912 cw(c21.17,43.712) 21.37,43.712 21.37,43.112 ccw(c21.57,43.112) 21.77,43.112 21.77,43.798 cw(c21.97,43.798) 22.17,43.798 22.17,43.112 ccw(c22.37,43.112) 22.57,43.112 22.57,43.798 cw(c22.77,43.798) 22.97,43.798 22.97,43.112 ccw(c23.17,43.112) 23.37,43.112 23.37,43.712 cw(c23.57,43.712) 23.57,43.912 23.94,43.912 23.99,43.912 ccw(c23.99,44.112) 24.19,44.112 24.19,44.223 cw(c24.39,44.223) 24.59,44.223 24.59,43.498 ccw(c24.79,43.498) 24.99,43.498 24.99,43.712 cw(c25.19,43.712) 25.19,43.912 25.457,43.912 ccw(c25.457,44.056) 25.485,43.915 ccw(c25.457,44.056) 25.601,44.056 25.601,44.588 cw(c25.962,44.588) 25.707,44.843 25.902,45.038 cw(c26.294,44.646) 26.294,45.201 v1(26.524,45.201)
  L8:Bot w0.1: v1(16.272,41.281) DD1.P3@16.67,41.679
A3: DD1.N2 DD18.C13 | length 23.9
  L1:Top w0.1: v1(26.986,45.662) v1(26.986,45.662) 27.442,45.661 DD18.C13@27.444,45.66
  L6:Sig w0.1: v1(17.072,42.081) 16.341,42.081 cw(c16.341,42.502) 15.92,42.502 15.92,43.754 cw(c16.255,43.754) 16.255,44.089 17.497,44.089 17.547,44.089 ccw(c17.547,44.289) 17.747,44.289 17.747,44.384 cw(c17.947,44.384) 18.147,44.384 18.147,43.918 ccw(c18.347,43.918) 18.547,43.918 18.547,44.384 cw(c18.747,44.384) 18.947,44.384 18.947,44.289 ccw(c19.147,44.289) 19.147,44.089 19.739,44.089 20.12,44.089 20.17,44.089 ccw(c20.17,44.289) 20.37,44.289 20.37,44.291 cw(c20.57,44.291) 20.77,44.291 20.77,43.76 ccw(c20.97,43.76) 21.17,43.76 21.17,44.291 cw(c21.37,44.291) 21.57,44.291 21.57,43.76 ccw(c21.77,43.76) 21.97,43.76 21.97,44.291 cw(c22.17,44.291) 22.37,44.291 22.37,43.76 ccw(c22.57,43.76) 22.77,43.76 22.77,44.291 cw(c22.97,44.291) 23.17,44.291 23.17,43.76 ccw(c23.37,43.76) 23.57,43.76 23.57,43.889 cw(c23.77,43.889) 23.77,44.089 24.063,44.089 24.247,44.089 ccw(c24.247,44.527) 24.556,44.217 24.981,44.642 ccw(c24.644,44.978) 25.12,44.978 cw(c25.596,44.978) 25.26,45.315 25.899,45.954 cw(c26.065,45.79) 26.23,45.954 ; 26.231,45.954 26.362,45.823 ccw(c26.754,46.215) 26.363,45.821 ccw(c26.754,46.215) 26.754,45.66 26.984,45.66 v1(26.986,45.662)
  L8:Bot w0.1: v1(17.072,42.081) DD1.N2@17.47,42.479
A3V3: C64.2 C69.1 C71.1 D51.1 D51.2 DD18.C2 DD18.C3 DD18.D4 DD18.E4 DD18.F3 R49.2 VD1.1 | length 83.5
  L1:Top w0.25: DD18.C3@32.04,41.064 DD18.D4@32.04,41.983 DD18.E4@32.499,42.443 ; DD18.C2@32.499,40.604 v1(32.959,40.604)
  L1:Top w0.254: DD18.C3@32.04,41.064 DD18.C2@32.499,40.604 ; DD18.E4@32.499,42.443 DD18.F3@33.419,42.443
  L1:Top w0.5: D51.1@56.234,73.327 v2@62.315,73.327 ; D51.2@56.234,75.867 57.417,74.684 63.687,74.684 66.062,77.059 66.062,77.5 ; 66.059,77.5 R49.2@66.059,78.15
  L3:Sig w0.3: v1(32.959,40.604) cw(c33.488,40.075) 33.488,40.824 35.774,40.824 cw(c35.774,38.284) 37.571,40.08 38.907,38.743 ccw(c39.486,39.322) 39.486,38.503 45.059,38.503 61.296,54.74 61.296,72.313 v2(62.315,73.332)
  L8:Bot w0.3: v1(32.959,40.604) 33.342,40.987 35.536,40.987 35.651,40.987 35.737,41.064 35.865,41.179 C71.1@37.02,41.179 VD1.1@39.24,41.179
A4: DD1.P8 DD18.B9 | length 23.9
  L1:Top w0.1: v1(28.822,42.902) DD18.B9@28.822,43.362
  L3:Sig w0.1: v1(13.069,41.281) cw(c13.069,40.929) 13.42,40.929 13.42,39.106 ccw(c14.161,39.106) 13.637,38.582 13.907,38.313 ccw(c14.788,39.194) 14.731,37.949 ccw(c14.788,39.194) 14.781,37.948 14.788,37.947 15.173,37.947 cw(c15.173,37.747) 15.373,37.747 15.373,37.66 ccw(c15.573,37.66) 15.773,37.66 15.773,38.129 cw(c15.973,38.129) 16.173,38.129 16.173,37.66 ccw(c16.373,37.66) 16.573,37.66 16.573,37.747 cw(c16.773,37.747) 16.773,37.947 16.823,37.947 18.096,37.947 ccw(c18.096,38.648) 18.797,38.648 cw(c19.219,38.648) 19.219,39.07 19.772,39.07 cw(c19.772,38.536) 20.15,38.914 20.32,38.743 ccw(c20.803,39.226) 20.803,38.543 23.34,38.543 ccw(c23.34,39.42) 23.96,38.8 ; 23.96,38.8 27.794,42.634 ; 27.795,42.634 cw(c28.442,41.985) 28.442,42.902 v1(28.822,42.902)
  L8:Bot w0.1: DD1.P8@12.67,41.679 v1(13.069,41.281)
A5: DD1.P2 DD18.E10 | length 23.3
  L1:Top w0.1: v1(17.02,38.543) cw(c17.864,39.387) 16.671,39.387 16.671,41.274 cw(c17.084,41.274) 16.792,41.566 cw(c17.059,41.299) 17.059,41.677 17.355,41.677 ccw(c17.355,41.949) 17.547,41.756 v1(17.869,42.078) ; v1(29.282,45.201) DD18.E10@29.742,45.201
  L3:Sig w0.1: v1@17.122,38.585 cw(c17.02,38.686) 17.031,38.543 cw(c17.02,38.686) v1(17.02,38.543) 17.346,38.869 ccw(c17.146,39.069) 17.429,39.069 17.429,39.254 ccw(c17.349,39.254) 17.349,39.335 17.272,39.335 cw(c17.272,39.485) 17.122,39.485 cw(c17.307,39.485) 17.307,39.669 18.028,39.669 ccw(c18.028,40.099) 18.332,39.795 18.437,39.899 cw(c18.783,39.553) 18.783,40.043 20.27,40.043 20.32,40.043 ccw(c20.32,40.243) 20.52,40.243 20.52,40.383 cw(c20.72,40.383) 20.92,40.383 20.92,40.081 ccw(c21.12,40.081) 21.32,40.081 21.32,40.383 cw(c21.52,40.383) 21.72,40.383 21.72,40.243 ccw(c21.92,40.243) 21.92,40.043 22.495,40.043 23.67,40.043 ccw(c23.67,41.234) 24.512,40.391 ; 24.512,40.392 26.674,42.553 ccw(c26.351,42.877) 26.808,42.877 26.808,42.965 cw(c27.342,42.965) 26.965,43.343 28.66,45.038 ; 28.66,45.038 cw(c29.052,44.646) 29.052,45.201 v1(29.282,45.201)
  L8:Bot w0.1: DD1.P2@17.47,41.679 v1(17.869,42.078)
A6: DD1.R8 DD18.C10 | length 23.9
  L1:Top w0.1: v1(28.363,44.281) DD18.C10@28.822,44.281
  L6:Sig w0.1: v1(12.272,40.481) ccw(c12.707,40.046) 12.235,40.441 ccw(c12.707,40.046) 12.092,40.046 12.092,39.597 ccw(c12.59,39.597) 12.237,39.245 12.855,38.627 ccw(c13.343,39.115) 13.343,38.425 13.882,38.425 cw(c13.882,38.231) 14.077,38.231 ccw(c14.271,38.231) 14.271,38.037 16.251,38.037 ccw(c16.251,38.263) 16.478,38.263 16.478,38.739 cw(c16.682,38.739) 16.682,38.943 18.282,38.943 ccw(c18.282,39.455) 18.644,39.093 cw(c19.006,38.731) 19.006,39.243 22.42,39.243 ccw(c22.42,40.209) 23.103,39.525 ; 23.103,39.526 24.483,40.906 25.165,41.587 cw(c25.306,41.446) 25.447,41.587 ; 25.448,41.587 ccw(c25.589,41.728) 25.731,41.587 ccw(c25.589,41.728) 25.731,41.869 25.601,41.999 cw(c25.743,42.14) 25.601,42.282 cw(c25.743,42.14) 25.884,42.282 26.014,42.152 ccw(c26.155,42.294) 26.297,42.152 ccw(c26.155,42.294) 26.297,42.435 26.167,42.565 cw(c26.309,42.706) 26.167,42.847 cw(c26.309,42.706) 26.45,42.847 26.579,42.718 ccw(c26.721,42.859) 26.862,42.718 ccw(c26.721,42.859) 26.862,43.001 ; 26.862,43.001 cw(c27.003,43.143) 26.862,43.284 26.897,43.32 27.701,44.123 cw(c28.083,43.74) 28.083,44.281 v1(28.363,44.281)
  L8:Bot w0.1: v1(12.272,40.481) DD1.R8@12.67,40.879
A7: DD1.R2 DD18.B10 | length 23.7
  L1:Top w0.1: v1(17.072,41.278) 17.155,41.278 cw(c17.155,40.986) 17.446,40.986 17.446,40.33 ccw(c17.697,40.33) 17.697,40.079 18.458,40.079 cw(c18.458,39.868) 18.669,39.868 cw(c18.464,39.868) 18.464,39.662 17.24,39.662 ccw(c17.24,39.505) 17.082,39.505 ccw(c17.224,39.505) 17.224,39.363 17.411,39.363 cw(c17.411,39.154) 17.62,39.154 v1(17.62,38.543) ; v1(27.903,43.822) DD18.B10@28.363,43.822 v1(27.903,43.822)
  L3:Sig w0.1: v1(17.62,38.543) 18.096,39.019 ; 18.097,39.019 cw(c19.12,37.994) 19.12,39.443 20.445,39.443 20.895,39.443 cw(c20.895,39.243) 21.095,39.243 21.095,39.074 ccw(c21.295,39.074) 21.495,39.074 21.495,39.563 cw(c21.695,39.563) 21.895,39.563 21.895,39.074 ccw(c22.095,39.074) 22.295,39.074 22.295,39.563 cw(c22.495,39.563) 22.695,39.563 22.695,39.074 ccw(c22.895,39.074) 23.095,39.074 23.095,39.243 cw(c23.295,39.243) 23.295,39.443 23.649,39.443 23.984,39.443 ccw(c23.984,39.838) 24.263,39.558 ; 24.263,39.559 27.695,42.991 ccw(c27.193,43.493) 27.903,43.493 v1(27.903,43.822)
  L8:Bot w0.1: v1(17.072,41.278) DD1.R2@17.47,40.879